# Altium PCB PCB1.PcbDoc (part 1 of 2)
Units mil, origin at the board's own origin, x right, y up, seen from the top; angles counter-clockwise.
Board outline 2100 x 2250 mil, 4 copper layers (Top Layer, GND1, GND2, Bottom Layer), stack 23.756 mil thick; 82 components, 47 nets, 265 pads, 106 vias.
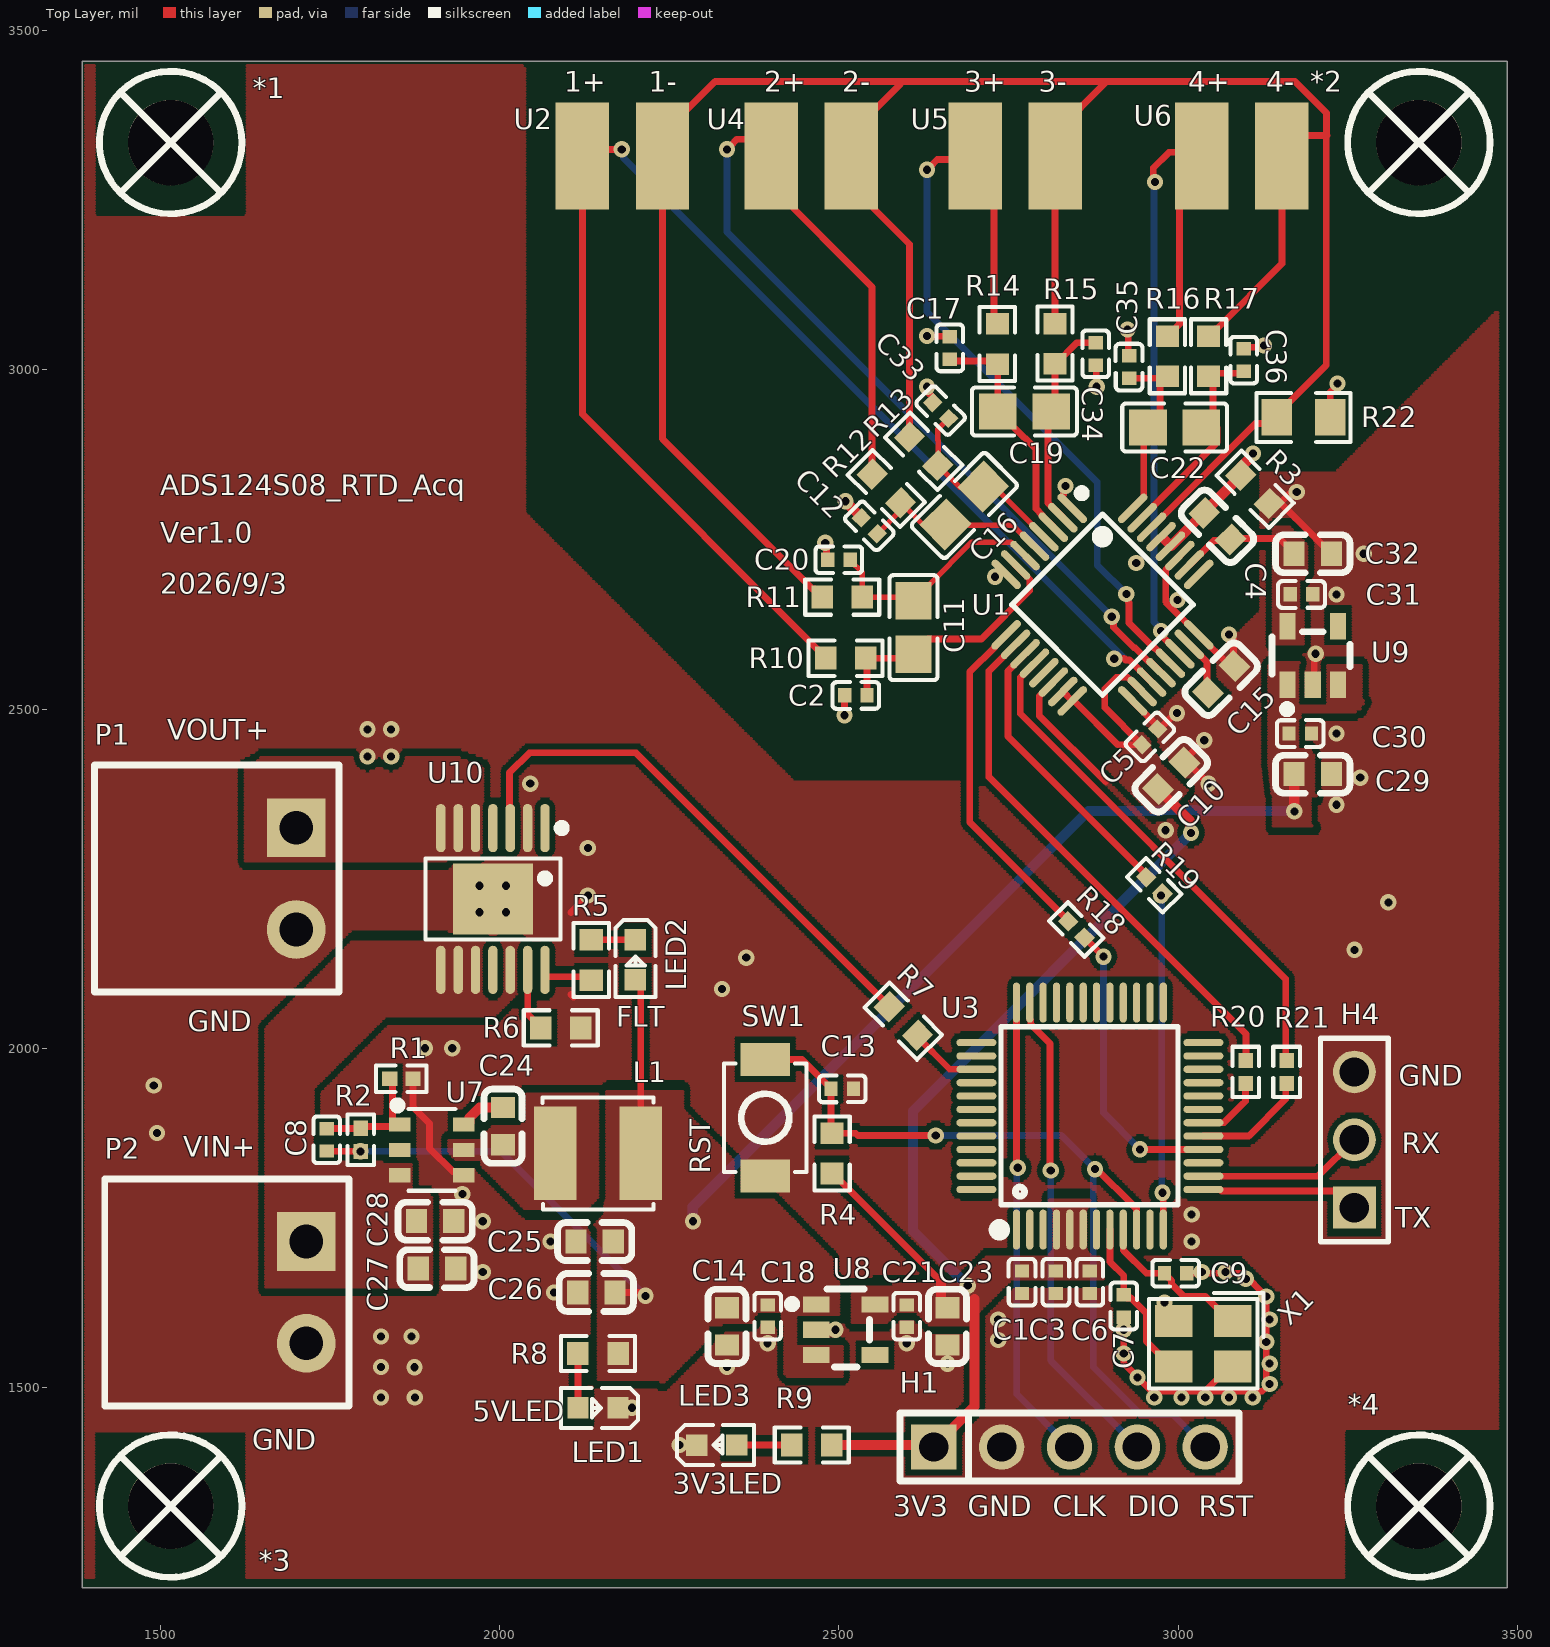
[diagram p0: Top Layer view]
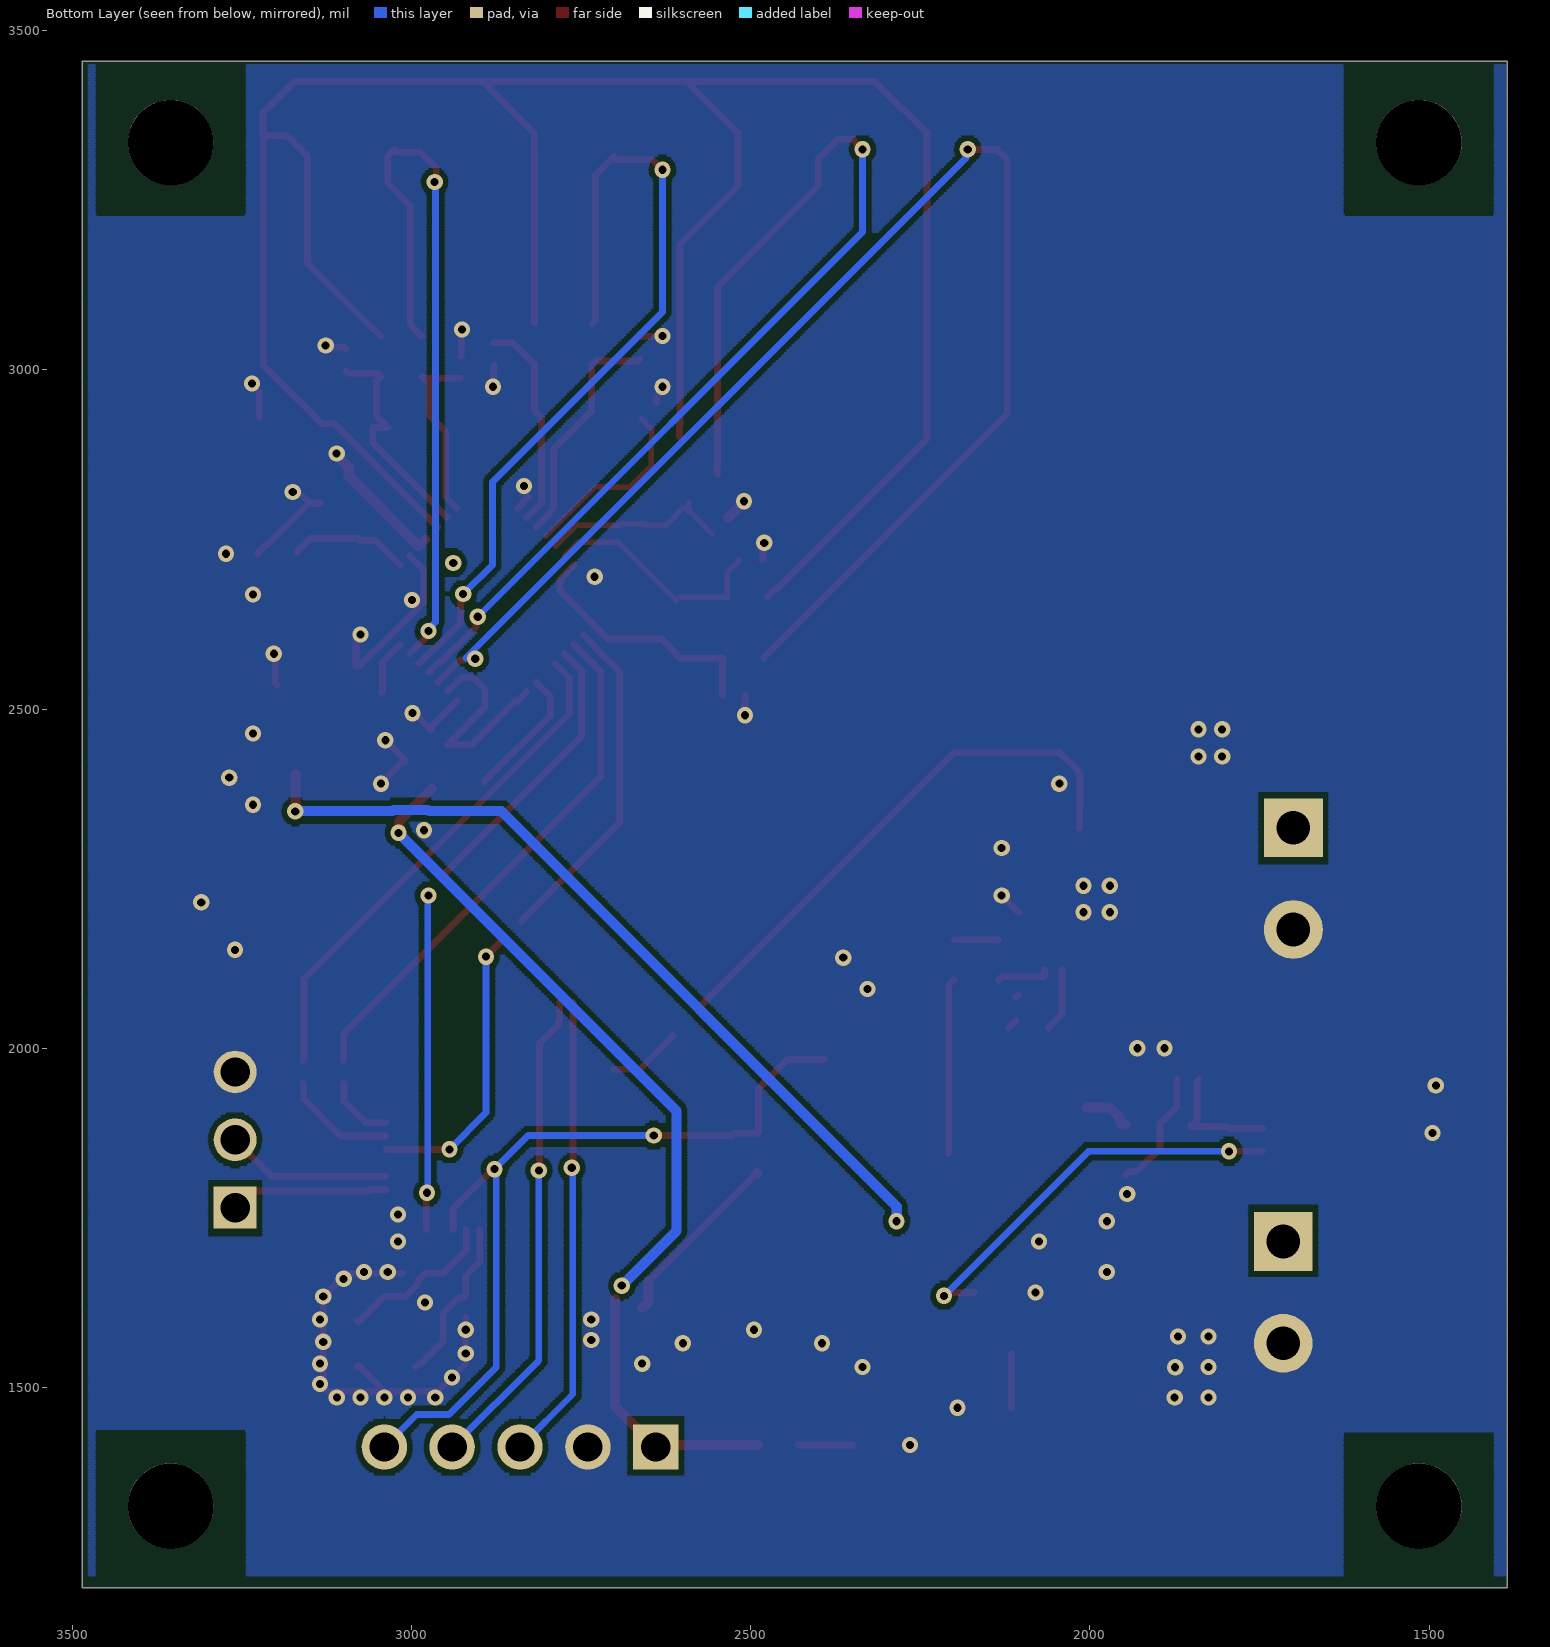
[diagram p1: Bottom Layer view, seen from below]
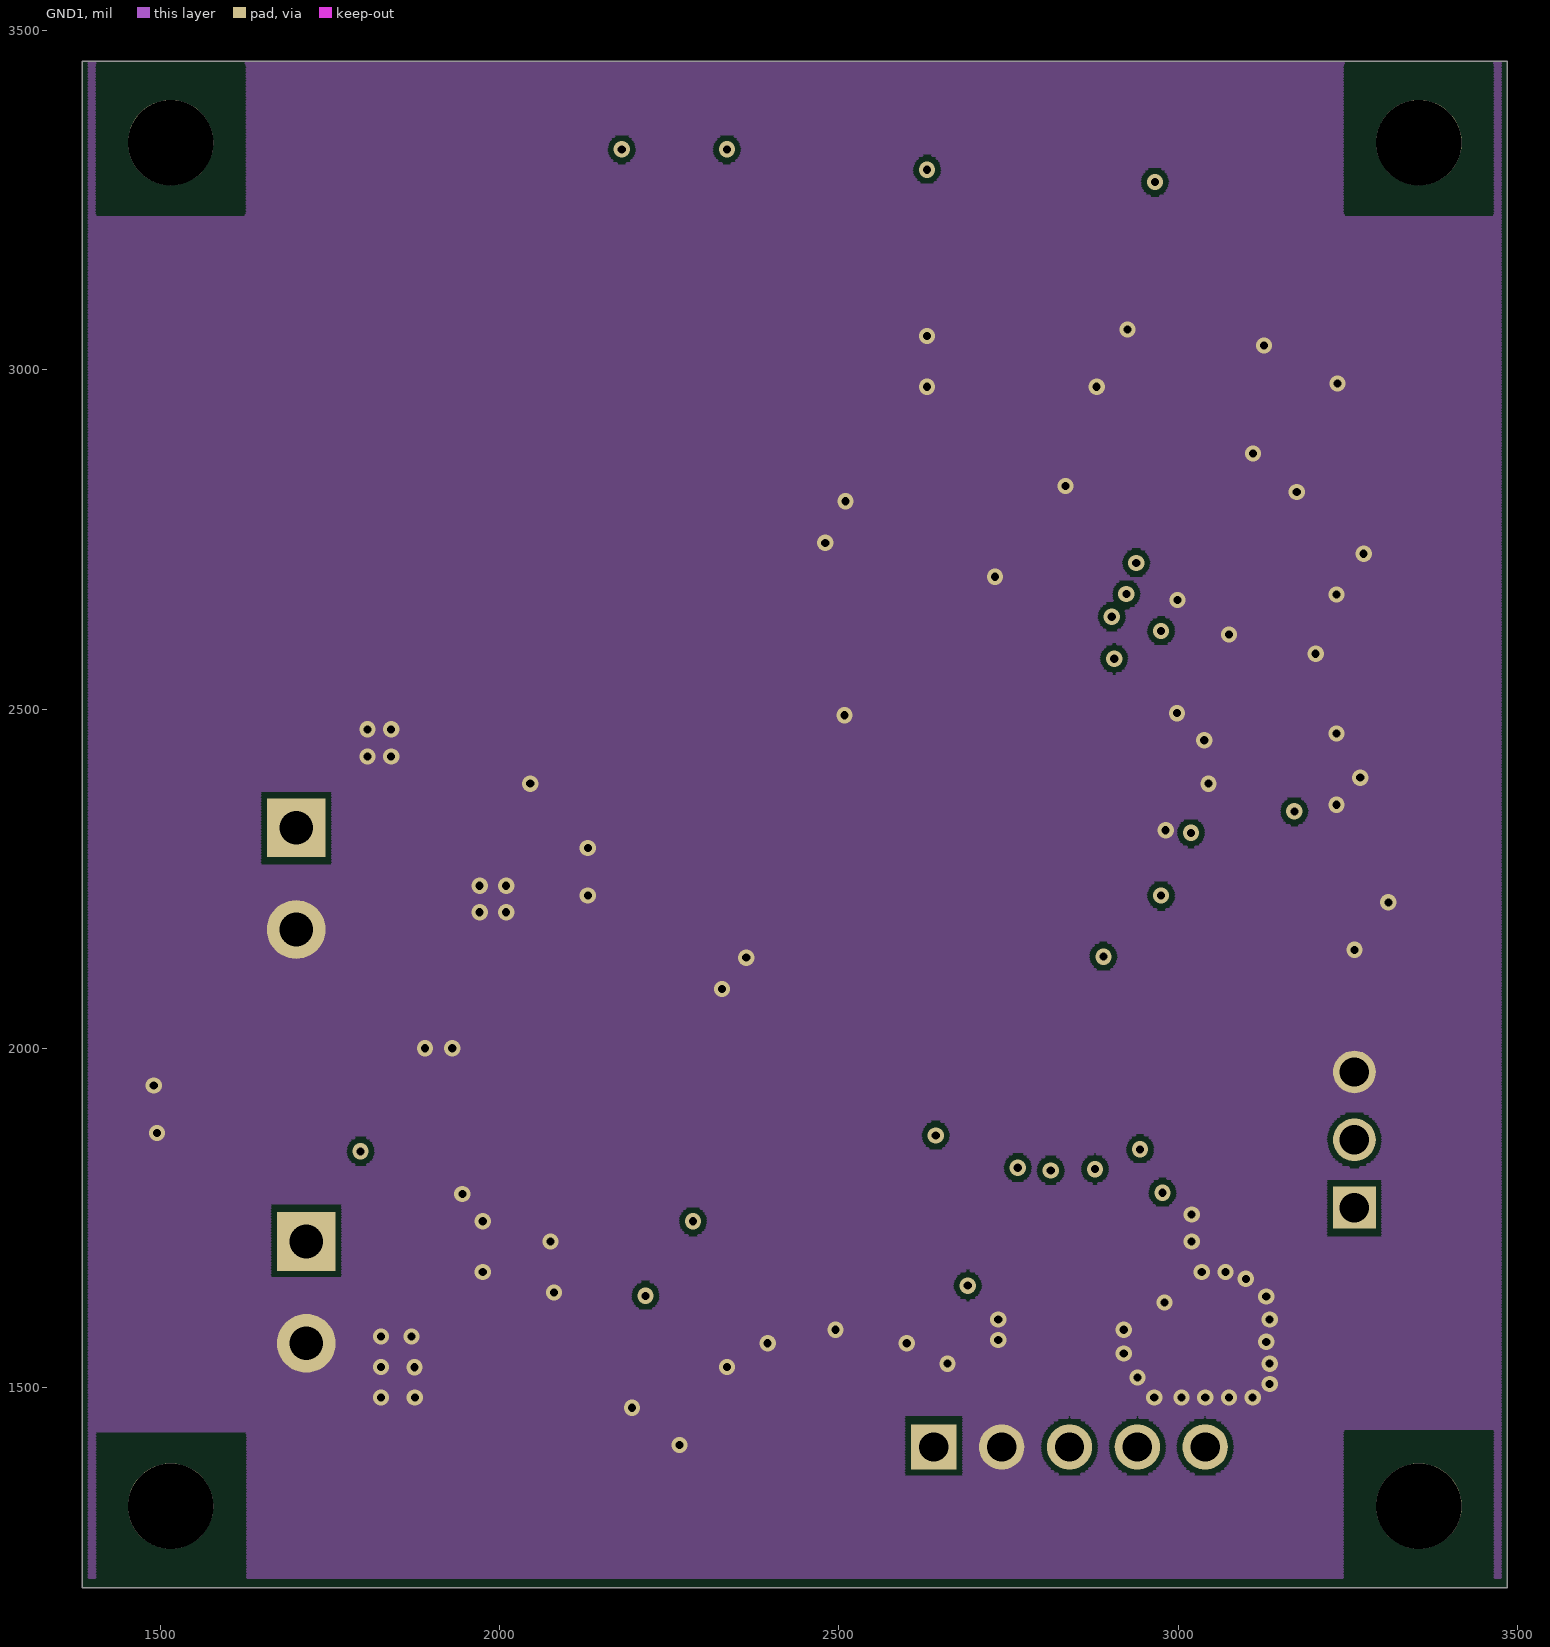
[diagram p2: GND1]
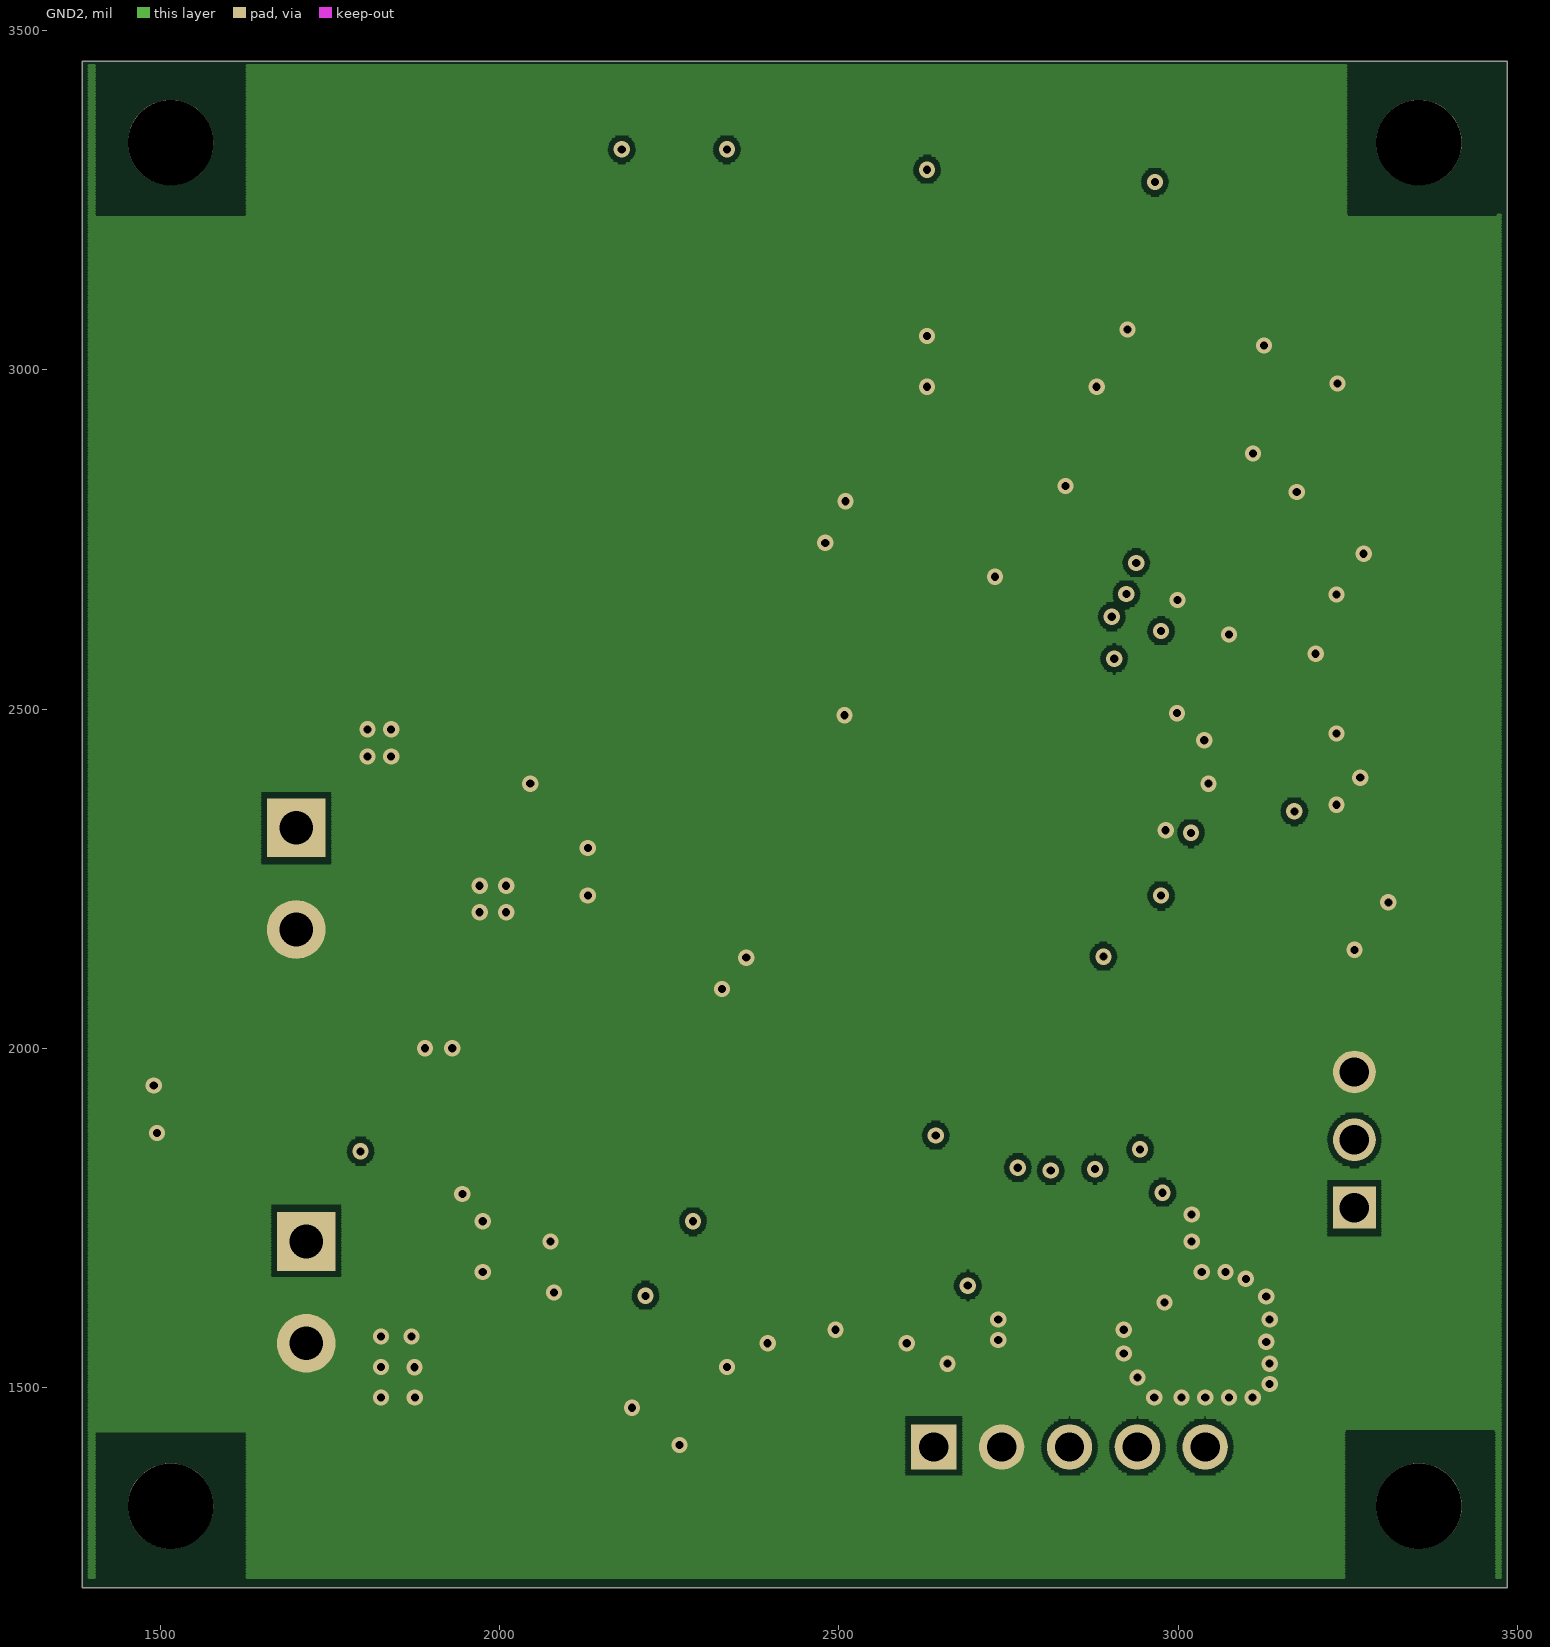
[diagram p3: GND2]

## Layer stack, top to bottom
Top Solder: solder mask 0.4, Solder Resist, Dk 3.5
Top Layer: signal copper 1.4
Dielectric 2: prepreg 2.8, PP-006, Dk 4.1
GND1: signal copper 1.378
Dielectric 1: dielectric 12.6, FR-4, Dk 4.8
GND2: signal copper 1.378
Dielectric 3: prepreg 2.8, PP-006, Dk 4.1
Bottom Layer: signal copper 1.4
Bottom Solder: solder mask 0.4, Solder Resist, Dk 3.5

## Board outline
1385,1205 1385,3455 3485,3455 3485,1205

## Design rules (kind name [scope] priority, off if disabled: settings)
Clearance [All] p1: gap=8 ignorepadtopadclearanceinfootprint=FALSE
ComponentClearance [All] p1: gap=0 collisioncheckmode=3 verticalgap=0 showdistances=FALSE
HoleSize [All] p1: absolutevalues=TRUE maxlimit=130 minlimit=1 maxpercent=80.000 minpercent=20.000
MinimumSolderMaskSliver [All] p1: minsoldermaskwidth=4
PlaneConnect [All] p1: planeconnectstyle=Direct reliefexpansion=20 reliefentries=4 reliefconductorwidth=10 reliefairgap=10
PolygonConnect [All] p1: connectstyle=Direct reliefconductorwidth=10 reliefentries=4 polygonreliefangle="90 Angle" airgapwidth=10
RoutingVias [All] p1: holewidth=28 width=50 viastyle="Through Hole" minholewidth=28 minwidth=50 maxholewidth=28 maxwidth=50
SilkToSilkClearance [All] p1: silktosilkclearance=2
SilkToSolderMaskClearance [IsPad] p1: minsilkscreentomaskgap=2 clearancetoexposedcopper=TRUE
SolderMaskExpansion [All] p1: expansion=0 istentingtop=FALSE
SupplyNets "Schematic Supply Nets_2" [InNet('VOUT')] p1: voltage=0.000
SupplyNets "Schematic Supply Nets_7" [InNet('GND')] p2: voltage=0.000
SupplyNets "Schematic Supply Nets_6" [InNet('VIN')] p3: voltage=0.000
SupplyNets "Schematic Supply Nets_5" [InNet('A3V3')] p4: voltage=0.000
SupplyNets "Schematic Supply Nets" [InNet('3V3')] p5: voltage=0.000
SupplyNets "Schematic Supply Nets_4" [InNet('5V')] p6: voltage=0.000
Width [All] p1: maxlimit=50 minlimit=6 preferedwidth=10
24 further rules are at their usual default settings.

## Components (designator, comment, footprint, x,y, rotation, side; value= is the part's Value field where it differs from the comment)
*1 "螺丝孔_1" M3螺丝 1515,3335 r0 top
*2 "螺丝孔_1" M3螺丝 3355,3335 r0 top
*3 "螺丝孔_1" M3螺丝 1515,1325 r0 top
*4 "螺丝孔_1" M3螺丝 3355,1325 r0 top
C1 "cc0402krx7r7bb104" C0402 2770,1655 r270 top value=100nF
C2 "grm1555c1h472je01d" C0402 2525,2520 r180 top value=4.7nF
C3 "cc0402krx7r7bb104" C0402 2820,1655 r270 top value=100nF
C4 "cl10b474ka8nnnc" C0603 3058.04,2769.4 r135 top value=470nF
C5 "cc0402krx7r7bb104" C0402 2958.55,2458.89 r225 top value=100nF
C6 "cc0402krx7r7bb104" C0402 2870,1655 r270 top value=100nF
C7 "cc0402jrnpo9bn180" C0402 2920,1620 r270 top value=18pF
C8 "cc0402jrnpo9bn101" C0402 1745,1865 r270 top value=100pF
C9 "cc0402jrnpo9bn180" C0402 2996.46,1668.39 r180 top value=18pF
C10 "hgc0603r5106m350nthj" C0603 2989.94,2401.65 r45 top value=10uF
C11 "cl21b103kbannnc" C0805 2610,2620 r270 top value=10nF
C12 "grm1555c1h472je01d" C0402 2545,2770 r135 top value=4.7nF
C13 "cc0402krx7r7bb104" C0402 2505,1940 r180 top value=100nF
C14 "cga0603x5r105k500jt" C0603 2335,1590 r270 top value=1uF
C15 "cga0603x5r105k500jt" C0603 3063.55,2543.89 r45 top value=1uF
C16 "cl21b103kbannnc" C0805 2685,2800 r225 top value=10nF
C17 "grm1555c1h472je01d" C0402 2663.55,3032.35 r90 top value=4.7nF
C18 "cc0402krx7r7bb104" C0402 2395,1605 r270 top value=100nF
C19 "cl21b103kbannnc" C0805 2773.55,2938.55 r180 top value=10nF
C20 "grm1555c1h472je01d" C0402 2500,2720 r180 top value=4.7nF
C21 "cc0402krx7r7bb104" C0402 2600,1605 r270 top value=100nF
C22 "cl21b103kbannnc" C0805 2995,2915 r180 top value=10nF
C23 "cga0603x5r105k500jt" C0603 2660,1590 r270 top value=1uF
C24 "cga0603x7r104k500jt" C0603 2005,1885 r90 top value=100nF
C25 "hgc0603r5226m160nthj" C0603 2140,1715 r0 top value=22uF
C26 "hgc0603r5226m160nthj" C0603 2142.44,1640 r0 top value=22uF
C27 "hgc0603r5106m350nthj" C0603 1907.56,1675 r180 top value=10uF
C28 "cga0603x7r104k500jt" C0603 1905,1745 r180 top value=100nF
C29 "cga0603x5r105k500jt" C0603 3198.55,2403.89 r0 top value=1uF
C30 "cc0402krx7r7bb104" C0402 3180.09,2463.89 r0 top value=100nF
C31 "cc0402krx7r7bb104" C0402 3182.01,2668.89 r0 top value=100nF
C32 "cga0603x5r105k500jt" C0603 3198.55,2728.89 r0 top value=1uF
C33 "grm1555c1h472je01d" C0402 2650,2940 r135 top value=4.7nF
C34 "grm1555c1h472je01d" C0402 2878.55,3023.55 r270 top value=4.7nF
C35 "grm1555c1h472je01d" C0402 2927.77,3004.06 r90 top value=4.7nF
C36 "grm1555c1h472je01d" C0402 3096.72,3014.31 r90 top value=4.7nF
H1 "pz254v-11-05p" HDR-TH_5P-P2.54-V-M 2840.05,1412.16 r0 top
H4 "lail-pz2.54-3p-l" HDR-TH_3P-P2.54-V-M-1 3260,1865 r90 top
L1 "wpn4020h100mt" IND-SMD_L4.0-W4.0 2145,1845 r0 top value=10uH
LED1 "ltst-c190kskt" LED0603-RD 2145,1470 r180 top
LED2 "ltst-c190kskt" LED0603-RD 2200.01,2130.51 r270 top
LED3 "ltst-c190kskt" LED0603-RD 2320,1415 r0 top
P1 "wj15edgrc-3.81-02p-14-00a" CONN-TH_2P-P3.81_WJ15EDGRC-3.81-2P 1700,2250 r270 top
P2 "wj15edgrc-3.81-02p-14-00a" CONN-TH_2P-P3.81_WJ15EDGRC-3.81-2P 1715,1640 r270 top
R1 "rt0402brd0726k1l" R0402 1855,1955 r180 top value=26.1kΩ
R2 "frc0402f1373ts" R0402 1795,1865 r90 top value=137kΩ
R3 "0603waf0000t5e" R0603 3113.55,2823.89 r135 top value=0Ω
R4 "frc0603f1002ts" R0603 2490,1845 r270 top value=10kΩ
R5 "0603waf1001t5e" R0603 2135,2130 r90 top value=1kΩ
R6 "frc0603f3601ts" R0603 2090,2030 r0 top value=3.6kΩ
R7 "0603waf1001t5e" R0603 2595,2040 r135 top value=1kΩ
R8 "0603waf1001t5e" R0603 2145,1550 r0 top value=1kΩ
R9 "0603waf1001t5e" R0603 2460,1415 r0 top value=1kΩ
R10 "frc0603f1000ts" R0603 2510,2575 r180 top value=100Ω
R11 "frc0603f1000ts" R0603 2505,2665 r180 top value=100Ω
R12 "frc0603f1000ts" R0603 2570,2825 r135 top value=100Ω
R13 "frc0603f1000ts" R0603 2625,2880 r135 top value=100Ω
R14 "frc0603f1000ts" R0603 2733.55,3038.21 r90 top value=100Ω
R15 "frc0603f1000ts" R0603 2818.55,3038.55 r90 top value=100Ω
R16 "frc0603f1000ts" R0603 2984.32,3020 r90 top value=100Ω
R17 "frc0603f1000ts" R0603 3045,3020 r90 top value=100Ω
R18 "frc0402f47r0ts" R0402 2850,2175 r135 top value=47Ω
R19 "frc0402f47r0ts" R0402 2965,2240 r135 top value=47Ω
R20 "frc0402f47r0ts" R0402 3100,1965 r90 top value=47Ω
R21 "frc0402f47r0ts" R0402 3160,1965 r90 top value=47Ω
R22 "frc0805f3001ts" R0805 3185,2930 r0 top value=3kΩ
SW1 "ts-1088-ar02016" SW-SMD_L3.9-W3.0-P4.45 2391.45,1897.48 r90 top
U1 "ads124s08ipbsr_c39676001" TQFP-32_L5.0-W5.0-P0.50-LS7.0-BL 2888.55,2653.89 r225 top
U2 "pt1000焊盘" PT1000焊盘 2121.89,3315 r0 top
U3 "stm32g031c8t6" LQFP-48_L7.0-W7.0-P0.50-LS9.0-BL 2870,1900 r0 top
U4 "pt1000焊盘" PT1000焊盘 2400.44,3315 r0 top
U5 "pt1000焊盘" PT1000焊盘 2701.04,3315 r0 top
U6 "pt1000焊盘" PT1000焊盘 3035,3315 r0 top
U7 "ap63201wu-7" TSOT-23-6_L2.9-W1.6-P0.95-LS2.8-BR 1900,1850 r180 top
U8 "tps7a2033pdbvr" SOT-23-5_L2.9-W1.6-P0.95-LS2.8-BR 2510,1585 r180 top
U9 "tps7a2033pdbvr" SOT-23-5_L2.9-W1.6-P0.95-LS2.8-BR 3198.55,2578.89 r270 top
U10 "tps27s100apwpr" TSSOP-14_L5.0-W4.4-P0.65-LS6.4-BL-EP 1990,2220 r180 top
X1 "x32258mob4si" CRYSTAL-SMD_4P-L3.2-W2.5-BL 3037.18,1564.39 r180 top value=8MHz

## Footprints (in the part's own frame and the unit in brackets; to place one, negate y for a bottom-side part, rotate by r counter-clockwise, add the part's x,y. Pads: shape width x height; smd on the part's side, far side on the other; paste and mask are expansions set on the pad)
C0402 [mm]
  rect 0.5x0.54 smd: 1(-0.42,0) 2(0.42,0)
  silkscreen extent -0.87,-0.5 0.87,0.5
C0603 [mm]
  rect 0.8x0.9 smd: 1(-0.7,0) 2(0.7,0)
  silkscreen extent -1.39,-0.71 1.39,0.71
C0805 [mm]
  rect 1.41x1.35 smd paste-100 mask+0.051: 1(-1,0) 2(1,0)
  silkscreen extent -1.96,-0.9 1.96,0.9
CONN-TH_2P-P3.81_WJ15EDGRC-3.81-2P [mm]
  rect 2.2x2.2 hole 1.26: 1(-1.905,0)
  round 2.2 hole 1.26: 2(1.905,0)
  silkscreen extent -4.25,-7.55 4.25,1.6
CRYSTAL-SMD_4P-L3.2-W2.5-BL [mm]
  rect 1.4x1.2 smd: 1(-1.1,-0.85) 2(1.1,-0.85) 3(1.1,0.85) 4(-1.1,0.85)
  silkscreen extent -2.26,-1.91 2.03,1.68
HDR-TH_3P-P2.54-V-M-1 [mm]
  rect 1.575x1.6 hole 1.1 paste-2539.97 mask+0.05: 1(-2.54,0)
  round 1.6 hole 1.1 paste-2539.97 mask+0.05: 2(0,0) 3(2.54,0)
  silkscreen extent -3.81,-1.27 3.81,1.27
HDR-TH_5P-P2.54-V-M [mm]
  rect 1.7x1.7 hole 1.1: 1(-5.08,0)
  round 1.7 hole 1.1: 2(-2.54,0) 3(0,0) 4(2.54,0) 5(5.08,0)
  silkscreen extent -6.35,-1.27 6.35,1.27
IND-SMD_L4.0-W4.0 [mm]
  rect 1.6x3.5 smd: 1(-1.6,0) 2(1.6,0)
  silkscreen extent -2.08,-2.1 2.08,2.1
LED0603-RD [mm]
  rect 0.8x0.8 smd: 1(-0.749,0) 2(0.749,0)
  silkscreen extent -1.49,-0.75 1.39,0.76
LQFP-48_L7.0-W7.0-P0.50-LS9.0-BL [mm]
  oval 0.27x1.5 smd paste+0 mask+0.05: 1(-2.75,-4.25) 2(-2.25,-4.25) 3(-1.75,-4.25) 4(-1.25,-4.25) 5(-0.75,-4.25) 6(-0.25,-4.25) 7(0.25,-4.25) 8(0.75,-4.25) 9(1.25,-4.25) 10(1.75,-4.25) 11(2.25,-4.25) 12(2.75,-4.25) 25(2.75,4.25) 26(2.25,4.25) 27(1.75,4.25) 28(1.25,4.25) 29(0.75,4.25) 30(0.25,4.25) 31(-0.25,4.25) 32(-0.75,4.25) 33(-1.25,4.25) 34(-1.75,4.25) 35(-2.25,4.25) 36(-2.75,4.25)
  oval 1.5x0.27 smd paste+0 mask+0.05: 13(4.25,-2.75) 14(4.25,-2.25) 15(4.25,-1.75) 16(4.25,-1.25) 17(4.25,-0.75) 18(4.25,-0.25) 19(4.25,0.25) 20(4.25,0.75) 21(4.25,1.25) 22(4.25,1.75) 23(4.25,2.25) 24(4.25,2.75) 37(-4.25,2.75) 38(-4.25,2.25) 39(-4.25,1.75) 40(-4.25,1.25) 41(-4.25,0.75) 42(-4.25,0.25) 43(-4.25,-0.25) 44(-4.25,-0.75) 45(-4.25,-1.25) 46(-4.25,-1.75) 47(-4.25,-2.25) 48(-4.25,-2.75)
  silkscreen extent -3.59,-4.46 3.3,3.34
M3螺丝 [mil]
  round 126 hole 126 paste-99999 mask+4: 1(0,0)
  silkscreen extent -105,-105 105,105
PT1000焊盘 [mm]
  rect 2x4 smd: 1(0,0) 2(3,0)
R0402 [mm]
  rect 0.566x0.54 smd paste-100 mask+0.051: 1(-0.433,0) 2(0.433,0)
  silkscreen extent -0.94,-0.5 0.94,0.5
R0603 [mil]
  rect 31.75x34.02 smd paste-3937.01 mask+2: 1(-29.66,0) 2(29.66,0)
  silkscreen extent -55,-26 55,26
R0805 [mil]
  rect 44.59x54.21 smd paste-3937.01 mask+2: 1(-39.37,0) 2(39.37,0)
  silkscreen extent -69,-36 69,36
SOT-23-5_L2.9-W1.6-P0.95-LS2.8-BR [mm]
  rect 1x0.6 smd paste+0 mask+0.05: 1(1.1,-0.95) 2(1.1,0) 3(1.1,0.95) 4(-1.1,0.95) 5(-1.1,-0.95)
  silkscreen extent -0.89,-1.52 2.16,1.4
SW-SMD_L3.9-W3.0-P4.45 [mm]
  rect 1.23x1.86 smd: 1(-2.185,0) 2(2.185,0)
  silkscreen extent -2.03,-1.54 2.03,1.54
TQFP-32_L5.0-W5.0-P0.50-LS7.0-BL [mm]
  oval 0.28x1.45 smd: 1(-1.75,-3.35) 2(-1.25,-3.35) 3(-0.75,-3.35) 4(-0.25,-3.35) 5(0.25,-3.35) 6(0.75,-3.35) 7(1.25,-3.35) 8(1.75,-3.35) 17(1.75,3.35) 18(1.25,3.35) 19(0.75,3.35) 20(0.25,3.35) 21(-0.25,3.35) 22(-0.75,3.35) 23(-1.25,3.35) 24(-1.75,3.35)
  oval 1.45x0.28 smd: 9(3.35,-1.75) 10(3.35,-1.25) 11(3.35,-0.75) 12(3.35,-0.25) 13(3.35,0.25) 14(3.35,0.75) 15(3.35,1.25) 16(3.35,1.75) 25(-3.35,1.75) 26(-3.35,1.25) 27(-3.35,0.75) 28(-3.35,0.25) 29(-3.35,-0.25) 30(-3.35,-0.75) 31(-3.35,-1.25) 32(-3.35,-1.75)
  silkscreen extent -2.55,-3.65 2.4,2.4
TSOT-23-6_L2.9-W1.6-P0.95-LS2.8-BR [mm]
  rect 0.8x0.532 smd: 1(1.2,-0.95) 2(1.2,0) 3(1.2,0.95) 4(-1.2,0.95) 5(-1.2,0) 6(-1.2,-0.95)
  silkscreen extent -0.88,-1.82 1.44,1.53
TSSOP-14_L5.0-W4.4-P0.65-LS6.4-BL-EP [mm]
  oval 0.35x1.809 smd: 1(-1.95,-2.655) 2(-1.3,-2.655) 3(-0.65,-2.655) 4(0,-2.655) 5(0.65,-2.655) 6(1.3,-2.655) 7(1.95,-2.655) 8(1.95,2.655) 9(1.3,2.655) 10(0.65,2.655) 11(0,2.655) 12(-0.65,2.655) 13(-1.3,2.655) 14(-1.95,2.655)
  rect 3x2.65 smd: 15(0,0)
  silkscreen extent -2.73,-2.8 2.53,1.52

## Part data
C1 C3 C5 C6 C13 C18 C21 C30 C31: "容值:100nF;精度:±10%;额定电压:16V;温度系数:X7R;", JLCPCB Part Class="Extended Part", LCSC Part Name="100nF ±10% 16V", Manufacturer=YAGEO(国巨), ManufacturerPart=CC0402KRX7R7BB104, Temperature Coefficient=X7R, Tolerance=±10%, Voltage Rating=16V, AddInBom=yes, ConvertToPcb=yes, Datasheet=https://item.szlcsc.com/datasheet/CC0402KRX7R7BB104/61526.html, FootprintName=C0402, ModelId=36a51122f27c49738f86b3bfa98863e0, ModelName=C0402_L1.0-W0.5-H0.5, ModelTransform=39.37,19.685,0,0,0,0,0,0,0, Supplier=LCSC, Supplier Footprint=0402, SupplierPart=C60474, Symbol=CC0402KRX7R7BB104
C2 C12 C17 C20 C33 C34 C35 C36: "容值:4.7nF;精度:±5%;额定电压:50V;温度系数:C0G;", JLCPCB Part Class="Extended Part", LCSC Part Name="4.7nF ±5% 50V", Manufacturer=muRata(村田), ManufacturerPart=GRM1555C1H472JE01D, Temperature Coefficient=C0G, Tolerance=±5%, Voltage Rating=50V, AddInBom=yes, ConvertToPcb=yes, Datasheet=https://item.szlcsc.com/datasheet/GRM1555C1H472JE01D/1609001.html, FootprintName=C0402, ModelId=36a51122f27c49738f86b3bfa98863e0, ModelName=C0402_L1.0-W0.5-H0.5, ModelTransform=39.37,19.685,0,0,0,0,0,0,0, Supplier=LCSC, Supplier Footprint=0402, SupplierPart=C1518204, Symbol=GRM1555C1H472JE01D
C4: "容值:470nF;精度:±10%;额定电压:25V;温度系数:X7R;", JLCPCB Part Class="Basic Part", LCSC Part Name="470nF ±10% 25V", Manufacturer=SAMSUNG(三星), ManufacturerPart=CL10B474KA8NNNC, Temperature Coefficient=X7R, Tolerance=±10%, Voltage Rating=25V, AddInBom=yes, ConvertToPcb=yes, Datasheet=https://item.szlcsc.com/datasheet/CL10B474KA8NNNC/1975.html, FootprintName=C0603, ModelId=ac125912035d415993ca9572d50418b1, ModelName=C0603_L1.6-W0.8-H0.8, ModelTransform=62.992,31.496,0,0,0,0,0,0,0, Supplier=LCSC, Supplier Footprint=0603, SupplierPart=C1623, Symbol=CL10B474KA8NNNC
C7 C9: "容值:18pF;精度:±5%;额定电压:50V;温度系数:NP0;", JLCPCB Part Class="Extended Part", LCSC Part Name="18pF ±5% 50V", Manufacturer=YAGEO(国巨), ManufacturerPart=CC0402JRNPO9BN180, Temperature Coefficient=NP0, Tolerance=±5%, Voltage Rating=50V, AddInBom=yes, ConvertToPcb=yes, Datasheet=https://item.szlcsc.com/datasheet/CC0402JRNPO9BN180/107417.html, FootprintName=C0402, ModelId=36a51122f27c49738f86b3bfa98863e0, ModelName=C0402_L1.0-W0.5-H0.5, ModelTransform=39.37,19.685,0,0,0,0,0,0,0, Supplier=LCSC, Supplier Footprint=0402, SupplierPart=C106202, Symbol=CC0402JRNPO9BN180
C8: "容值:100pF;精度:±5%;额定电压:50V;温度系数:NP0;", JLCPCB Part Class="Extended Part", LCSC Part Name="100pF ±5% 50V", Manufacturer=YAGEO(国巨), ManufacturerPart=CC0402JRNPO9BN101, Temperature Coefficient=NP0, Tolerance=±5%, Voltage Rating=50V, AddInBom=yes, ConvertToPcb=yes, Datasheet=https://item.szlcsc.com/datasheet/CC0402JRNPO9BN101/107415.html, FootprintName=C0402, ModelId=36a51122f27c49738f86b3bfa98863e0, ModelName=C0402_L1.0-W0.5-H0.5, ModelTransform=39.37,19.685,0,0,0,0,0,0,0, Supplier=LCSC, Supplier Footprint=0402, SupplierPart=C106200, Symbol=CC0402JRNPO9BN101
C10 C27: "容值:10uF;精度:±20%;额定电压:35V;温度系数:X5R;", JLCPCB Part Class="Extended Part", LCSC Part Name="10uF ±20% 35V", Manufacturer=Chinocera(华瓷), ManufacturerPart=HGC0603R5106M350NTHJ, Temperature Coefficient=X5R, Tolerance=±20%, Voltage Rating=35V, AddInBom=yes, ConvertToPcb=yes, Datasheet=https://item.szlcsc.com/datasheet/HGC0603R5106M350NTHJ/23841132.html, FootprintName=C0603, ModelId=ac125912035d415993ca9572d50418b1, ModelName=C0603_L1.6-W0.8-H0.8, ModelTransform=62.992,31.496,0,0,0,0,0,0,0, Supplier=LCSC, Supplier Footprint=0603, SupplierPart=C22367827, Symbol=HGC0603R5106M350NTHJ
C11 C16 C19 C22: "容值:10nF;精度:±10%;额定电压:50V;温度系数:X7R;", JLCPCB Part Class="Basic Part", LCSC Part Name="10nF ±10% 50V", Manufacturer=SAMSUNG(三星), ManufacturerPart=CL21B103KBANNNC, Temperature Coefficient=X7R, Tolerance=±10%, Voltage Rating=50V, AddInBom=yes, ConvertToPcb=yes, Datasheet=https://item.szlcsc.com/datasheet/CL21B103KBANNNC/2062.html, FootprintName=C0805, ModelId=1ba041120af144c991958decab20d241, ModelName=C0805_L2.0-W1.3-H1.3, ModelTransform=78.74,51.181,0,0,0,0,0,0.0005,0, Supplier=LCSC, Supplier Footprint=0805, SupplierPart=C1710, Symbol=CL21B103KBANNNC
C14 C15 C23 C29 C32: "容值:1uF;精度:±10%;额定电压:50V;温度系数:X5R;", JLCPCB Part Class="Extended Part", LCSC Part Name="1uF ±10% 50V 停产", Manufacturer=HRE(芯声), ManufacturerPart=CGA0603X5R105K500JT, Temperature Coefficient=X5R, Tolerance=±10%, Voltage Rating=50V, AddInBom=yes, ConvertToPcb=yes, Datasheet=https://item.szlcsc.com/datasheet/CGA0603X5R105K500JT/7062558.html, FootprintName=C0603, ModelId=ac125912035d415993ca9572d50418b1, ModelName=C0603_L1.6-W0.8-H0.8, ModelTransform=62.992,31.496,0,0,0,0,0,0,0, Supplier=LCSC, Supplier Footprint=0603, SupplierPart=C6119852, Symbol=CGA0603X5R105K500JT
C24 C28: "容值:100nF;精度:±10%;额定电压:50V;温度系数:X7R;", JLCPCB Part Class="Extended Part", LCSC Part Name="100nF ±10% 50V", Manufacturer=HRE(芯声), ManufacturerPart=CGA0603X7R104K500JT, Temperature Coefficient=X7R, Tolerance=±10%, Voltage Rating=50V, AddInBom=yes, ConvertToPcb=yes, Datasheet=https://item.szlcsc.com/datasheet/CGA0603X7R104K500JT/7062573.html, FootprintName=C0603, ModelId=ac125912035d415993ca9572d50418b1, ModelName=C0603_L1.6-W0.8-H0.8, ModelTransform=62.992,31.496,0,0,0,0,0,0,0, Supplier=LCSC, Supplier Footprint=0603, SupplierPart=C6119867, Symbol=CGA0603X7R104K500JT
C25 C26: "容值:22uF;精度:±20%;额定电压:16V;温度系数:X5R;", JLCPCB Part Class="Extended Part", LCSC Part Name="22uF ±20% 16V", Manufacturer=Chinocera(华瓷), ManufacturerPart=HGC0603R5226M160NTHJ, Temperature Coefficient=X5R, Tolerance=±20%, Voltage Rating=16V, AddInBom=yes, ConvertToPcb=yes, Datasheet=https://item.szlcsc.com/datasheet/HGC0603R5226M160NTHJ/23841133.html, FootprintName=C0603, ModelId=ac125912035d415993ca9572d50418b1, ModelName=C0603_L1.6-W0.8-H0.8, ModelTransform=62.992,31.496,0,0,0,0,0,0,0, Supplier=LCSC, Supplier Footprint=0603, SupplierPart=C22367828, Symbol=HGC0603R5226M160NTHJ
H1: "插针结构:1x5P;间距:2.54mm;行距:-;圆针/方针:方针;安装方式:直插;排数:单排;总PIN位数:5P;额定电流:3A;额定电压:250V;配合针长度:6mm;塑高:2.5mm;端接针长度:3mm;触头材质:黄铜;触头镀层:-;工作温度:-40℃~+105℃;颜色:黑色;", Color=黑色, Current Rating=3A, JLCPCB Part Class="Extended Part", LCSC Part Name="1x5P 间距:2.54mm 方针 直插", Manufacturer=XFCN(兴飞), ManufacturerPart=PZ254V-11-05P, Operating Temperature=-40℃~+105℃, Voltage Rating (Max)=250V, AddInBom=yes, Circluar Pins/Square Pins=方针, Contact Material=黄铜, Contact Plating=-, ConvertToPcb=yes, Datasheet=https://item.szlcsc.com/datasheet/PZ254V-11-05P/502960.html, FootprintName=HDR-TH_5P-P2.54-V-M, Insulation Height=2.5mm, Length of End Connection Pin=3mm, Length of Mating Pin=6mm, ModelId=47d466e4a34f4fc5bc626cf773a24dd5, ModelName=HDR-TH_5P-P2.54-M-LI-1X5P, ModelTransform=499.999,100,0,0,0,0,0,0,-118.11, Mounting Type=直插, Number of Pins=5P, Number of Rows=单排, Pin Structure=1x5P, Pitch=2.54mm, Row Spacing=-, Supplier=LCSC, Supplier Footprint=插件,P=2.54mm, SupplierPart=C492404, Symbol=PZ254V-11-05P
H4: "插针结构:1x3P;间距:2.54mm;圆针/方针:方针;排数:单排;总PIN位数:3P;额定电流:3A;额定电压:250V;塑高:2.5mm;端接针长度:3mm;触头材质:黄铜;触头镀层:金;工作温度:-25℃~+80℃;颜色:黑色;", Color=黑色, Current Rating=3A, JLCPCB Part Class="Extended Part", LCSC Part Name="1x3P 间距:2.54mm 方针", Manufacturer=LAILAN(莱联), ManufacturerPart=LAIL-PZ2.54-3P-L, Operating Temperature=-25℃~+80℃, Voltage Rating (Max)=250V, AddInBom=yes, Circluar Pins/Square Pins=方针, Contact Material=黄铜, Contact Plating=金, ConvertToPcb=yes, Datasheet=https://item.szlcsc.com/datasheet/LAIL-PZ2.54-3P-L/58519957.html, FootprintName=HDR-TH_3P-P2.54-V-M-1, Insulation Height=2.5mm, Length of End Connection Pin=3mm, ModelId=94a8ffe137b6410295cb18cd3ffd99db, ModelName=HDR-M-2.54_1x3, ModelTransform=299.9994,100,0,0,0,0,0,0,-118.11, Number of Pins=3P, Number of Rows=单排, Pin Structure=1x3P, Pitch=2.54mm, Supplier=LCSC, Supplier Footprint=插件,P=2.54mm, SupplierPart=C54950604, SymbolName=LAIL-PZ2.54-3P-L
L1: "电感值:10uH;精度:±20%;额定电流:2A;饱和电流(Isat):3.5A;类型:-;", Current - Saturation(Isat)=3.5A, Current Rating=2A, DC Resistance(DCR)=216mΩ, JLCPCB Part Class="Extended Part", LCSC Part Name="10uH ±20% 3.5A", Manufacturer=Sunlord(顺络), ManufacturerPart=WPN4020H100MT, Ratings=-, Tolerance=±20%, AddInBom=yes, ConvertToPcb=yes, Datasheet=https://item.szlcsc.com/datasheet/WPN4020H100MT/99573.html, FootprintName=IND-SMD_L4.0-W4.0, ModelId=45bc3737ecfd4f3bb122605ee525b018, ModelName=IND-SMD_L4.0-W4.0-H1.9, ModelTransform=157.48,157.484,0,0,0,0,0,0,0, Supplier=LCSC, Supplier Footprint=SMD,4x4mm, SupplierPart=C98364, Symbol=WPN4020H100MT, Type=-
LED1 LED2 LED3: "灯头类型:-;发光颜色:黄色;正向压降(Vf):2.1V;功率:75mW;正向电流:20mA;波长:584.5nm~597nm;二极管配置:独立二极管;透镜颜色:无色透明透镜;色温:-;发光强度:104mcd;发光角度:130°;载带方式:-;工作温度:-30℃~+85℃;", Color Temperature=-, Forward Current=20mA, Illumination Color=黄色, JLCPCB Part Class="Extended Part", LCSC Part Name=黄灯, Lens Color=无色透明透镜, Manufacturer=LITEON(光宝), ManufacturerPart=LTST-C190KSKT, Operating Temperature=-30℃~+85℃, Power(Watts)=75mW, Voltage - Forward(Vf)=2.1V, AddInBom=yes, ConvertToPcb=yes, Datasheet=https://item.szlcsc.com/datasheet/LTST-C190KSKT/136371.html, Diode Configuration=独立二极管, FootprintName=LED0603-RD, Lamp Holder Type=-, Luminous Intensity=104mcd, ModelId=1f0d29a91be547639d425604e9b96ebb, ModelName=LED0603-RD, ModelTransform=63.7794,32.283,0,0,0,0,0,0,0, Mounting Style=-, Peak Wavelength=588nm, Supplier=LCSC, Supplier Footprint=0603, SupplierPart=C125095, Symbol=LTST-C190KSKT, Viewing Angle=130°, Wavelength - Dominant=584.5nm~597nm
P1 P2: "连接器类型:板端/插座-闭口;固定方式:无固定装置;结构:1x2P;间距:3.81mm;颜色:绿色;安装方式:弯插;排数:1;每排PIN数:2;额定电流:8A;额定电压:300V;线规 - AWG:-;线规 - 平方毫米:-;工作温度:-40℃~+105℃;", Color=绿色, Current Rating=8A, JLCPCB Part Class="Extended Part", LCSC Part Name="无固定装置 1x2P 3.81mm 排数:1 每排P数:2", Manufacturer=KANGNEX(康奈克斯电气), ManufacturerPart=WJ15EDGRC-3.81-02P-14-00A, Operating Temperature=-40℃~+105℃, Voltage Rating (Max)=300V, AddInBom=yes, Connection Type=-, Connector Type=板端/插座-闭口, ConvertToPcb=yes, Datasheet=https://item.szlcsc.com/datasheet/WJ15EDGRC-3.81-02P-14-00A/8881.html, FootprintName=CONN-TH_2P-P3.81_WJ15EDGRC-3.81-2P, ModelId=816ec8aca6fe4785be70cb4c5121258d, ModelName=CONN-TH_2P_L8.5-W9.2-H7.0-P3.81, ModelTransform=334.645,360.2355,0,0,0,0,0,-118.11,-137.795, Mounting Type=弯插, Number of Pins=2P, Number of PINs Per Row=2, Number of Positions or Pins=1x2P, Number of Rows=1, Outlet Direction (Vertical Basis)=-, Pitch=3.81mm, Supplier=LCSC, Supplier Footprint=弯插,P=3.81mm, SupplierPart=C8387, Symbol=WJ15EDGRC-3.81-2P, Termination Style=无固定装置, Wire Gauge - AWG=-, Wire Gauge - mm2=-
R1: "电阻类型:薄膜电阻;阻值:26.1kΩ;精度:±0.1%;功率:62.5mW;工作电压:50V;温度系数:±25ppm/℃;", JLCPCB Part Class="Extended Part", LCSC Part Name="薄膜电阻 26.1kΩ ±0.1% 62.5mW", Manufacturer=YAGEO(国巨), ManufacturerPart=RT0402BRD0726K1L, Operating Temperature=-55℃~+155℃, Power(Watts)=62.5mW, Temperature Coefficient=±25ppm/℃, Tolerance=±0.1%, Voltage-Supply(Max)=50V, AddInBom=yes, ConvertToPcb=yes, Datasheet=https://item.szlcsc.com/datasheet/RT0402BRD0726K1L/775872.html, FootprintName=R0402, ModelId=98c88bc2b9094f218f3a3e30a7012738, ModelName=R0402_L1.0-W0.5-H0.4, ModelTransform=39.37,19.685,0,0,0,0,0,0,0, Supplier=LCSC, Supplier Footprint=0402, SupplierPart=C728557, Symbol=RT0402BRD0726K1L, Type=薄膜电阻
R2: "电阻类型:厚膜电阻;阻值:137kΩ;精度:±1%;功率:62.5mW;工作电压:50V;温度系数:±100ppm/℃;", JLCPCB Part Class="Extended Part", LCSC Part Name="137kΩ ±1% 62.5mW 厚膜电阻", Manufacturer=FOJAN(富捷), ManufacturerPart=FRC0402F1373TS, Operating Temperature=-55℃~+155℃, Power(Watts)=62.5mW, Temperature Coefficient=±100ppm/℃, Tolerance=±1%, Voltage-Supply(Max)=50V, AddInBom=yes, ConvertToPcb=yes, Datasheet=https://item.szlcsc.com/datasheet/FRC0402F1373TS/5781091.html, FootprintName=R0402, ModelId=98c88bc2b9094f218f3a3e30a7012738, ModelName=R0402_L1.0-W0.5-H0.4, ModelTransform=39.37,19.685,0,0,0,0,0,0,0, Supplier=LCSC, Supplier Footprint=0402, SupplierPart=C5153963, Symbol=FRC0402F1373TS, Type=厚膜电阻
R3: "电阻类型:厚膜电阻;阻值:0Ω;精度:±1%;功率:100mW;工作电压:75V;温度系数:-;", JLCPCB Part Class="Basic Part", LCSC Part Name="0Ω ±1% 100mW 厚膜电阻", Manufacturer=UNI-ROYAL(厚声), ManufacturerPart=0603WAF0000T5E, Operating Temperature=-55℃~+155℃, Power(Watts)=100mW, Temperature Coefficient=-, Tolerance=±1%, Voltage-Supply(Max)=75V, AddInBom=yes, ConvertToPcb=yes, Datasheet=https://item.szlcsc.com/datasheet/0603WAF0000T5E/21903.html, FootprintName=R0603, ModelId=fc143cca1e79419f9cd78b61e9279f08, ModelName=R0603, ModelTransform=31.8897,63.7794,0,90,0,0,0,0,0, Supplier=LCSC, Supplier Footprint=0603, SupplierPart=C21189, Symbol=0603WAF0000T5E, Type=厚膜电阻
R4: "电阻类型:厚膜电阻;阻值:10kΩ;精度:±1%;功率:100mW;工作电压:75V;温度系数:±100ppm/℃;", JLCPCB Part Class="Extended Part", LCSC Part Name="10kΩ ±1% 100mW 厚膜电阻", Manufacturer=FOJAN(富捷), ManufacturerPart=FRC0603F1002TS, Operating Temperature=-55℃~+155℃, Power(Watts)=100mW, Temperature Coefficient=±100ppm/℃, Tolerance=±1%, Voltage-Supply(Max)=75V, AddInBom=yes, ConvertToPcb=yes, Datasheet=https://item.szlcsc.com/datasheet/FRC0603F1002TS/3180495.html, FootprintName=R0603, ModelId=fc143cca1e79419f9cd78b61e9279f08, ModelName=R0603, ModelTransform=31.8897,63.7794,0,90,0,0,0,0,0, Supplier=LCSC, Supplier Footprint=0603, SupplierPart=C2906982, Symbol=FRC0603F1002TS, Type=厚膜电阻
R5 R7 R8 R9: "电阻类型:厚膜电阻;阻值:1kΩ;精度:±1%;功率:100mW;工作电压:75V;温度系数:±100ppm/℃;", JLCPCB Part Class="Basic Part", LCSC Part Name="1kΩ ±1% 100mW 厚膜电阻", Manufacturer=UNI-ROYAL(厚声), ManufacturerPart=0603WAF1001T5E, Operating Temperature=-55℃~+155℃, Power(Watts)=100mW, Temperature Coefficient=±100ppm/℃, Tolerance=±1%, Voltage-Supply(Max)=75V, AddInBom=yes, ConvertToPcb=yes, Datasheet=https://item.szlcsc.com/datasheet/0603WAF1001T5E/21904.html, FootprintName=R0603, ModelId=fc143cca1e79419f9cd78b61e9279f08, ModelName=R0603, ModelTransform=31.8897,63.7794,0,90,0,0,0,0,0, Supplier=LCSC, Supplier Footprint=0603, SupplierPart=C21190, Symbol=0603WAF1001T5E, Type=厚膜电阻
R6: "电阻类型:厚膜电阻;阻值:3.6kΩ;精度:±1%;功率:100mW;工作电压:75V;温度系数:±100ppm/℃;", JLCPCB Part Class="Extended Part", LCSC Part Name="3.6kΩ ±1% 100mW 厚膜电阻", Manufacturer=FOJAN(富捷), ManufacturerPart=FRC0603F3601TS, Operating Temperature=-55℃~+155℃, Power(Watts)=100mW, Temperature Coefficient=±100ppm/℃, Tolerance=±1%, Voltage-Supply(Max)=75V, AddInBom=yes, ConvertToPcb=yes, FootprintName=R0603, ModelId=fc143cca1e79419f9cd78b61e9279f08, ModelName=R0603, ModelTransform=31.8897,63.7794,0,90,0,0,0,0,0, Supplier=LCSC, Supplier Footprint=0603, SupplierPart=C2933208, Symbol=FRC0603F3601TS, Type=厚膜电阻
R10 R11 R12 R13 R14 R15 R16 R17: "电阻类型:厚膜电阻;阻值:100Ω;精度:±1%;功率:100mW;工作电压:75V;温度系数:±100ppm/℃;", JLCPCB Part Class="Extended Part", LCSC Part Name="100Ω ±1% 100mW 厚膜电阻", Manufacturer=FOJAN(富捷), ManufacturerPart=FRC0603F1000TS, Operating Temperature=-55℃~+155℃, Power(Watts)=100mW, Temperature Coefficient=±100ppm/℃, Tolerance=±1%, Voltage-Supply(Max)=75V, AddInBom=yes, ConvertToPcb=yes, Datasheet=https://item.szlcsc.com/datasheet/FRC0603F1000TS/3180494.html, FootprintName=R0603, ModelId=fc143cca1e79419f9cd78b61e9279f08, ModelName=R0603, ModelTransform=31.8897,63.7794,0,90,0,0,0,0,0, Supplier=LCSC, Supplier Footprint=0603, SupplierPart=C2906981, Symbol=FRC0603F1000TS, Type=厚膜电阻
R18 R19 R20 R21: "电阻类型:厚膜电阻;阻值:47Ω;精度:±1%;功率:62.5mW;工作电压:50V;温度系数:±100ppm/℃;", JLCPCB Part Class="Extended Part", LCSC Part Name="47Ω ±1% 62.5mW 厚膜电阻", Manufacturer=FOJAN(富捷), ManufacturerPart=FRC0402F47R0TS, Operating Temperature=-55℃~+155℃, Power(Watts)=62.5mW, Temperature Coefficient=±100ppm/℃, Tolerance=±1%, Voltage-Supply(Max)=50V, AddInBom=yes, ConvertToPcb=yes, Datasheet=https://item.szlcsc.com/datasheet/FRC0402F47R0TS/3186297.html, FootprintName=R0402, ModelId=98c88bc2b9094f218f3a3e30a7012738, ModelName=R0402_L1.0-W0.5-H0.4, ModelTransform=39.37,19.685,0,0,0,0,0,0,0, Supplier=LCSC, Supplier Footprint=0402, SupplierPart=C2909362, Symbol=FRC0402F47R0TS, Type=厚膜电阻
R22: "电阻类型:厚膜电阻;阻值:3kΩ;精度:±1%;功率:125mW;工作电压:150V;温度系数:±100ppm/℃;", JLCPCB Part Class="Extended Part", LCSC Part Name="3kΩ ±1% 125mW 厚膜电阻", Manufacturer=FOJAN(富捷), ManufacturerPart=FRC0805F3001TS, Operating Temperature=-55℃~+155℃, Power(Watts)=125mW, Temperature Coefficient=±100ppm/℃, Tolerance=±1%, Voltage-Supply(Max)=150V, AddInBom=yes, ConvertToPcb=yes, Datasheet=https://item.szlcsc.com/datasheet/FRC0805F3001TS/3180776.html, FootprintName=R0805, ModelId=37a81e68749a4138bd2dfa6897b24b85, ModelName=R0805_L2.0-W1.3-H0.6, ModelTransform=78.74,51.181,0,0,0,0,0,-0.0005,0, Supplier=LCSC, Supplier Footprint=0805, SupplierPart=C2907263, Symbol=FRC0805F3001TS, Type=厚膜电阻
SW1: "电路结构:单刀单掷;按钮形状:圆形按钮;作用力:1.6N;安装方式:立贴;开关长度:3.9mm;开关宽度:3mm;开关高度:2mm;带支架:不带支架;触点电流:50mA;额定电压:12V;带灯:-;工作寿命:10万次;", Actuator/Cap Color=黑色, Contact Current=50mA, IP Rating=-, JLCPCB Part Class="Basic Part", LCSC Part Name="3.9*3*2mm 立贴 轻触开关", Manufacturer=XUNPU(讯普), ManufacturerPart=TS-1088-AR02016, Operating Force=1.6N, Operating Temperature=-30℃~+80℃, Voltage Rating=12V, Actuator Style=圆形按钮, AddInBom=yes, Circuit=单刀单掷, ConvertToPcb=yes, Datasheet=https://item.szlcsc.com/datasheet/TS-1088-AR02016/763484.html, FootprintName=SW-SMD_L3.9-W3.0-P4.45, Length=3.9mm, Life=10万次, ModelId=b26698b69f274ffabef8a26c7d0e5dd1, ModelName=SW-SMD_L3.9-W2.9-H2.0-LS4.8, ModelTransform=188.976,114.174,0,0,0,0,0,0,0, Mounting Type=立贴, Supplier=LCSC, Supplier Footprint=SMD,4x3mm, SupplierPart=C720477, Switch Height=2mm, Symbol=TS-1088-AR02016, Termination Style=SMD接片, Width=3mm, with Bracket=不带支架, With Lamp=-
U1: "分辨率(位):24;采样率:4kHz;工作电压:2.7V~5.25V;接口类型:SPI;", Clock Frequency=4.096MHz, JLCPCB Part Class="Extended Part", LCSC Part Name="具有PGA和电压基准的低功耗、低噪声、高集成度6通道及12通道4kSPS、24位∑-Δ ADC", Manufacturer=TI(德州仪器), ManufacturerPart=ADS124S08IPBSR, Operating Temperature=-50℃~+125℃, Quiescent Current (Iq)=280uA, Voltage - Supply=2.7V~5.25V, Voltage Reference=内置, AddInBom=yes, Clock/Oscillator=内置, ConvertToPcb=yes, Datasheet=https://www.ti.com.cn/cn/lit/ds/symlink/ads124s08.pdf?ts=1739413233444&ref_url=https%253A%252F%252Fwww.ti.com.cn%252Fproduct%252Fcn%252FADS124S08, differential input=是, Features=多路复用器；双极性电源；自动校准；内置温度传感器, FootprintName=TQFP-32_L5.0-W5.0-P0.50-LS7.0-BL, Interface=SPI, ModelId=0723864a05e7424ab80b3c78d6a7d93a, ModelName=TQFP-32_L5.0-W5.0-H1.2-LS7.0-P0.50, ModelTransform=277.58783,277.58783,0,90,0,0,0.013,0,0, number of channels=12, Programmable Gain=支持, Resolution (Bits)=24, Sampling Rate=4kHz, Supplier=LCSC, Supplier Footprint=TQFP-32(5x5), SupplierPart=C39676001, Symbol=ADS124S08IPBSR_C39676001
U3: "CPU内核:ARM Cortex-M0+;CPU最大主频:64MHz;CPU位数:32 Bit;", JLCPCB Part Class="Extended Part", LCSC Part Name="主流Arm Cortex-M0+ MCU，具有64 KB Flash存储器、8 KB RAM、64 MHz CPU、2x USART、定时器、ADC和通信接口，1.7-3.6V", Manufacturer=ST(意法半导体), ManufacturerPart=STM32G031C8T6, Operating Temperature=-40℃~+85℃, Voltage - Supply=1.7V~3.6V, ADC (Bit)=12bit, AddInBom=yes, ConvertToPcb=yes, Core Size="32 Bit", CPU Core="ARM Cortex-M0+", CPU Maximum Speed=64MHz, Datasheet=https://item.szlcsc.com/datasheet/STM32G031C8T6/428993.html, EEPROM=-, FootprintName=LQFP-48_L7.0-W7.0-P0.50-LS9.0-BL, ModelId=093be70396ff421eb2cdb946d5311efc, ModelName=LQFP-48_L7.0-W7.0-H1.4-LS9.0-P0.50, ModelTransform=354.331,354.331,0,0,0,0,0,0,0, Number of I/O=44, Oscillator Type=内置+外置, Program Memory Type=FLASH, Program Storage Size=64KB, RAM Size=8KB, Supplier=LCSC, Supplier Footprint=LQFP-48(7x7), SupplierPart=C432205, Symbol=STM32G031C8T6
U7: "功能类型:降压型;工作电压:3.8V~32V;输出电压:-;输出电流:2A;输出类型:可调;", Frequency - Switching=500kHz, JLCPCB Part Class="Extended Part", LCSC Part Name="降压型 2A 3.8V~32V", Manufacturer=DIODES(美台), ManufacturerPart=AP63201WU-7, Operating Temperature=-40℃~+85℃, Output Current=2A, Output Voltage=-, Quiescent Current=22uA, Voltage - Supply=3.8V~32V, AddInBom=yes, ConvertToPcb=yes, Datasheet=https://item.szlcsc.com/datasheet/AP63201WU-7/2162627.html, Features=轻载高效模式；逐波限流；过流保护；EMI优化(抖频模式)；打嗝限流, FootprintName=TSOT-23-6_L2.9-W1.6-P0.95-LS2.8-BR, Function=降压型, ModelId=2c4039b5b88644c1bda4b4ba9e971667, ModelName=TSOT-23-6_L2.9-W1.6-H1.1-LS2.8-P0.95, ModelTransform=110.45568,114.173,0,180,0,0,-0.005,-0.0005,0, Number of Outputs=1, Output Type=可调, Supplier=LCSC, Supplier Footprint=TSOT-23-6, SupplierPart=C2071044, Switch tube (built-in/external)=内置, Symbol=AP63201WU-7, Synchronous Rectifier=是, Topology=降压式
U8 U9: "输出类型:固定;最大输入电压:6V;输出电压:3.3V;输出电流:300mA;输出极性:正极;", Dropout Voltage=140mV@(300mA), JLCPCB Part Class="Extended Part", LCSC Part Name="具有高 PSRR 的 300mA、超低噪声、低 IQ、低压降 (LDO) 线性稳压器", Manufacturer=TI(德州仪器), ManufacturerPart=TPS7A2033PDBVR, Maximum Input Voltage=6V, Operating Temperature=-40℃~+125℃@(Tj), Output Current=300mA, Output Voltage=3.3V, standby current=15uA, AddInBom=yes, ConvertToPcb=yes, Datasheet=https://www.ti.com/cn/lit/gpn/tps7a20, Feature=防静电保护；软启动；浪涌保护；低ESR；热保护(TSD)；欠压闭锁；过流保护(OCP)；带使能；防倒灌, FootprintName=SOT-23-5_L2.9-W1.6-P0.95-LS2.8-BR, ModelId=7ba65df16e7b4570af156e925f9c37fe, ModelName=SOT-23-5_L2.9-W1.6-P0.95-LS2.8-BR, ModelTransform=114.173,114.173,0,90,0,0,0,0,0, Number of Outputs=1, Output Polarity=正极, Output Type=固定, Supplier=LCSC, Supplier Footprint=SOT-23-5, SupplierPart=C2862740, Symbol=TPS7A2033PDBVR
U10: "类型:高侧开关;通道数:1;输入控制逻辑:高电平有效;工作电压:3.5V~40V;最大连续电流:4A;导通电阻:80mΩ;", JLCPCB Part Class="Extended Part", LCSC Part Name=单通道高侧开关，具备全面诊断功能、宽工作电压范围和可调节电流限制, Manufacturer=TI(德州仪器), ManufacturerPart=TPS27S100APWPR, Maximum Continuous Current=4A, Operating Temperature	-=-40℃~+125℃, Voltage - Supply=3.5V~40V, AddInBom=yes, Control Input Logic=高电平有效, ConvertToPcb=yes, Datasheet=https://www.ti.com/cn/lit/ds/symlink/tps27s100.pdf, Features=集成电荷泵；短路保护；反向电流阻断；过温保护；过流保护；欠压锁定, FootprintName=TSSOP-14_L5.0-W4.4-P0.65-LS6.4-BL-EP, ModelId=02f1f60386074b2ca8e111040ac061f2, ModelName=TSSOP-14_L5.0-W4.4-H1.0-LS6.4-P0.65, ModelTransform=236.714,196.85,0,90,0,0,0,0.0005,0, number of channels=1, RDS(on)=80mΩ, Supplier=LCSC, Supplier Footprint=HTSSOP-14-EP, SupplierPart=C2879389, Symbol=TPS27S100APWPR, Type=高侧开关
X1: "晶振类型:贴片晶振;频率:8MHz;常温频差:±10ppm;负载电容:12pF;频率稳定度:±20ppm;", Equivalent Series Resistance(ESR)=180Ω, Frequency Stability=±20ppm, JLCPCB Part Class="Extended Part", LCSC Part Name="YSX321SL 8MHZ 4P 3225 12PF ±10PPM -40~85℃ (±20PPM)", Load Capacitance=12pF, Manufacturer=YXC(扬兴晶振), ManufacturerPart=X32258MOB4SI, Normal temperature Frequency Tolerance=±10ppm, Operating Temperature=-40℃~+85℃, AddInBom=yes, ConvertToPcb=yes, Datasheet=https://item.szlcsc.com/datasheet/X32258MOB4SI/2777872.html, FootprintName=CRYSTAL-SMD_4P-L3.2-W2.5-BL, ModelId=ff2dfd5650294453a14147960efe1838, ModelName=CRYSTAL-SMD_4P-L3.2-W2.5-BL, ModelTransform=125.984,98.425,0,0,0,0,0,0,0, Supplier=LCSC, Supplier Footprint=SMD3225-4P, SupplierPart=C2682775, Symbol=X32258MOB4SI, Type=贴片晶振
U2: AddInBom=yes, ConvertToPcb=yes
U4 U5 U6: AddInBom=yes, ConvertToPcb=yes, SymbolName=PT1000焊盘

## Via types
v1: diameter 24, hole 12, Top Layer to Bottom Layer, tented both sides, 102 vias
v2: diameter 24, hole 12, Top Layer to Bottom Layer, 4 vias

## Nets (pads, with @x,y where several pads share a name; then routed paths per layer and width w, separated by ;. In a path a pad name is that pad's centre, name@x,y a point inside that pad or via, vN(x,y) a via of type N, cw(c..) or ccw(c..) an arc to the next point about the centre after c; other vN are vias at no path point)
3V3: C1.1 C3.1 C5.2 C6.1 C10.1 C21.1 C23.1 H1.1 R4.2 R9.2 U1.15 U1.16 U1.18 U3.4 U3.5 U3.6 U8.5 | length 1945.7
  Top Layer w10: R4.2@2491.13,1815.34 2650.66,1655.81 ; U1.15 U1.16 2844.68,2511.91 2845.69,2512.91 2911.41,2447.19 C5.2 2892.09,2501.96 2892.09,2529.66 2909.14,2546.7 2925.87,2546.7 2946.74,2525.83 U1.18
  Top Layer w15: R9.2 2637.2,1415 H1.1 2700,1472.11 2700,1630 ; R4.2 R4.2@2491.13,1815.34 ; 2650.66,1655.81 2650.66,1625.81 2658.91,1617.56 C23.1 ; C10.1 3017.79,2334.83 3017.79,2318.88 v1(3019.21,2317.46)
  Bottom Layer w15: v1(2690,1650) 2609.18,1730.82 2609.18,1907.21 v1@3019.61,2317.64
5V: C8.2 C14.1 C18.1 C25.2 C26.2 C29.1 C30.1 L1.2 LED2.2 R2.1 R8.2 U8.1 U8.3 U9.1 U9.3 | length 2054.4
  Top Layer w10: C8.2 1745.25,1848.21 1794.75,1848.21 v1(1795,1847.96) ; C26.2 v1@2205,1640 ; LED2.2 2207.99,2093.04 L1.2
  Top Layer w15: C29.1 3171.21,2403.67 3171.21,2349.33 v1(3171.42,2349.12)
  Bottom Layer w10: v1(1795,1847.96) 2002.04,1847.96 v1(2215,1635)
  Bottom Layer w15: v1@2284.6,1745.4 2284.6,1766.53 2867.8,2349.74 2974.05,2349.74 2975.6,2351.29 3026.48,2351.29 3028.03,2349.74 v1@3167.27,2349.74
  other v1: 2285,1745
A3V3: C4.1 C31.1 C32.1 U1.26 U9.5 | length 177.5
  Top Layer w10: U1.26 3052.78,2748.52 3076.14,2748.52 C4.1 3078.92,2751.3 3149.61,2751.3 C32.1@3169.66,2731.25
AIN0: C2.1 C11.2 R10.1 U1.7 | length 385.9
  Top Layer w10: C2.1 2541.54,2573.12 R10.1 2604.37,2575 C11.2 2610,2581.81 2631.57,2603.39 2710.28,2603.39 2781.37,2674.47 2781.37,2691.2 2760.5,2712.07 U1.7
AIN1: C11.1 C20.1 R11.1 U1.6 | length 348.3
  Top Layer w8: C20.1 2516.54,2719.21 2534.66,2701.09 R11.1 2604.37,2665 C11.1 ; C11.1@2610,2660.55 2632.57,2683.13 2632.8,2683.13 2695.83,2746.15 2753.71,2746.15 2773.59,2726.27 U1.6
AIN2: C12.1 C16.2 R12.1 U1.5 | length 280.3
  Top Layer w8: C12.1 2590.97,2792.58 R12.1@2590.97,2795.47 ; R12.1 2590.97,2798.35 2593.86,2795.47 2594.38,2795.99 2599.73,2795.99 2624.4,2771.33 2656.33,2771.33 2658,2773 2689.92,2773 2692.2,2770.72 2756.99,2770.72 2787.52,2740.19 U1.5
AIN3: C16.1 C33.1 R13.1 U1.4 | length 275.7
  Top Layer w8: R13.1 2678,2827 2712,2827 C16.1 2728.69,2827.84 U1.4@2802.25,2754.27 ; R13.1@2646.77,2859.83 2646.77,2895.21 2645.97,2896.01 2645.97,2912.58 C33.1
AIN4: C17.1 C19.2 R14.1 U1.3 | length 347.7
  Top Layer w10: C17.1 2666.22,3013.14 2728.96,3013.14 2734.18,3007.92 C19.2 ; C19.2@2734.93,2938.55 2735.36,2938.55 2756.94,2916.97 2756.94,2916.54 2790.48,2883 2790.48,2795.37 2799.69,2786.16 2799.69,2784.51 U1.3
AIN5: C19.1 C34.1 R15.1 U1.2 | length 311.9
  Top Layer w10: R15.1 2818.55,2939.63 2808.48,2929.56 2808.48,2803.83 2830.09,2782.22 U1.2 ; R15.1@2819.69,3008.89 2850.89,3040.09 C34.1
AIN6: C22.2 C35.1 R16.1 U1.32 | length 319.5
  Top Layer w10: C35.1 2981.5,2987.52 R16.1 2973.58,2979.6 2973.58,2932.95 2949.38,2908.75 U1.32@2949.38,2812.15 ; U1.32 U1.32@2949.38,2812.15 ; U1.32 U1.32@2949.38,2812.15 ; U1.32 U1.32@2949.38,2812.15
AIN7: C22.1 C36.1 R17.1 U1.31 | length 341
  Top Layer w10: U1.31@2947.08,2782.68 2947.47,2782.68 2963.5,2798.7 2963.5,2799.22 3057.22,2892.95 3057.22,2915 C22.1 3051.59,2932.22 3051.59,2983.75 R17.1 3049.54,2994.88 3093.83,2994.88 C36.1
AIN8: R16.2 U1.22 U6.1 | length 1107.6
  Top Layer w10: v1(2965.89,3276.86) 2963.4,3279.36 2963.4,3297.54 2986.49,3320.63 3020.63,3320.63 3025,3325 U6.1 3035,3275.63 3001.94,3242.57 3001.94,3067.28 2996.33,3061.67 2996.33,3060.54 2985.45,3049.66 R16.2 ; v1(2975,2615) 2975,2609.2 U1.22
  Bottom Layer w10: v1(2965.89,3276.86) 2964.44,3275.41 2964.44,2628.09 2975,2617.53 v1(2975,2615)
AIN9: R14.2 U1.21 U5.1 | length 1206.6
  Top Layer w10: v1@2635,3300 2645,3310 U5.1@2701.04,3310 ; U5.1 2728.65,3287.39 2728.65,3072.77 R14.2 ; v1@2927.86,2668.69 2926.49,2667.32 2926.49,2657.92 2927.86,2656.55 2927.86,2626.79 2964.64,2590 2966.08,2590 2988.49,2567.58 U1.21
  Bottom Layer w10: v1(2630,3295) 2630,3085.36 2880.74,2834.62 2880.74,2712.47 v1(2923.81,2669.41)
AIN10: R12.2 U1.20 U4.1 | length 1639
  Top Layer w10: v1@2340,3330 2350,3340 2370.44,3340 2400.44,3310 2400.44,3270.63 2549.03,3122.04 2549.03,2862.95 2549.83,2862.15 2549.83,2846.77 R12.2 ; v1@2900,2630 2904.58,2630 2905.01,2629.57 2905.01,2620.51 2935.2,2590.32 2936.54,2590.32 2956.71,2570.15 2958.37,2570.15 U1.20
  Bottom Layer w10: v1(2335,3325) 2335,3203.39 v1(2902.36,2636.04)
AIN11: R10.2 U1.19 U2.1 | length 2049.9
  Top Layer w10: v1@2170,3325 2136.89,3325 2121.89,3310 2121.89,2934.58 2480.34,2576.13 R10.2 ; 2920,2575 2922.68,2572.32 2928.36,2572.32 U1.19
  Bottom Layer w10: v1(2180,3325) 2182.68,3322.32 2182.68,3312.32 2920,2575
  other v1: 2905.93,2574.07
CS: R18.1 U3.16 | length 439.3
  Top Layer w10: R18.1 v1(2890,2135) ; v1(2944.07,1850.87) 2944.11,1850.83 U3.16 U3.16
  Bottom Layer w10: v1(2890,2135) 2890,1904.94 v1(2944.07,1850.87)
DIN: R20.1 U3.18 | length 101.6
  Top Layer w10: U3.18 3037.44,1890.28 3067.87,1890.28 3094.36,1916.76 3094.36,1916.82 3099.36,1921.83 3099.36,1947.32 R20.1
DOUT: R21.1 U3.17 | length 167.5
  Top Layer w10: U3.17 3037.44,1870.59 3104.36,1870.59 3158.68,1924.9 3158.68,1946.64 R21.1
EN: R7.1 U3.39 | length 110
  Top Layer w10: R7.1 2614.71,2017.77 2663.46,1969.02 2702.56,1969.02 U3.39
GND: C1.2 C2.2 C3.2 C4.2 C5.1 C6.2 C7.2 C9.1 C10.2 C12.2 C13.1 C14.2 C15.2 C17.2 C18.2 C20.2 C21.2 C23.2 C25.1 C26.1 C27.1 C28.1 C29.2 C30.2 C31.2 C32.2 C33.2 C34.2 C35.2 C36.2 H1.2 H4.3 LED1.1 LED3.1 P1.2 P2.2 R1.1 R3.1 R3.2 R6.2 R22.2 SW1.1 U1.1 U1.8 U1.14 U1.17 U1.24 U1.27 U1.28 U1.29 U7.4 U8.2 U9.2 U10.2 U10.15 X1.2 X1.4 | length 2291.9
  Top Layer w8: U7.4@1934.98,1819.07 1940.77,1819.07 U7.4
  Top Layer w10: R1.1 1872.04,1913.32 1896.49,1888.87 1896.49,1852.49 1930.9,1818.07 1941.77,1818.07 U7.4 ; 2104.99,2079.08 2108.78,2075.29 ; 2104.99,2199.99 v1(2130,2225) ; R6.2@2108.78,2040.88 R6.2 ; v1(2480,2745) 2481.73,2743.27 2481.73,2721.73 C20.2 ; v1(2508.46,2490.77) C2.2 ; v1(2630,2975) 2632.68,2972.32 2632.68,2965.28 2638.86,2959.1 2638.86,2952.25 C33.2@2638.45,2951.85 ; v1(2630,3050) 2630.56,3049.44 2663,3049.44 C17.2 ; U1.14 2816.17,2539.47 2795.3,2518.59 2795.3,2490.64 2892.97,2392.97 ; v1@2834.46,2828.75 2831.41,2825.7 2831.41,2816.11 2827.92,2812.63 2827.92,2811.96 U1.1 ; C34.2 2879.28,3006.28 2879.28,2975.72 v1(2880,2975) ; C7.2 2920,1535 2960.69,1494.31 v1@3039.93,1494.31 ; v1(2925.52,3059.59) 2926.64,3058.47 2926.64,3021.72 C35.2 ; U1.17 2933.09,2511.63 2970.25,2474.48 C5.1 2972.75,2470.58 2996.05,2493.89 v1(2998.55,2493.89) ; U1.27 3002.69,2725.99 2981.81,2705.11 2981.81,2658.07 U1.24 3076.51,2563.38 C15.2 3081.65,2564.77 3081.65,2603.35 v1(3075,2610) ; C9.1 3095.75,1668.39 v1(3130,1634.14) 3130,1500.16 3124.14,1494.31 v1@3039.93,1494.31 ; v1(3038.55,2453.89) 3009.43,2424.77 C10.2 3013.86,2421.14 v1(3045,2390) ; X1.4 3076.55,1530.93 v1@3039.93,1494.31 ; C36.2 3099.28,3033.41 3124.01,3033.41 v1(3126.57,3035.97) ; R3.1 3149.91,2802.91 3164.31,2817.32 3172.32,2817.32 v1(3175,2820) ; R3.1@3135.33,2803.72 3150.71,2803.72 3212.82,2741.6 3215.37,2741.6 3226.11,2730.86 C32.2 ; U9.2 3200.7,2537.73 3200.7,2579.29 v1(3202.84,2581.44) ; R22.2 3224.37,2967.68 3235,2978.3 v1(3235,2980)
  Top Layer w15: v1(2509.92,2806.38) 2509.92,2805.73 2533.3,2782.35 C12.2 ; 2980,2750 2988.77,2741.23 U1.28 2989.31,2740.19 3038.01,2788.89 C4.2 3038.55,2789.86 3092.58,2843.89 R3.2 3092.58,2856.47 3110.33,2874.22 v1(3110.33,2876.66)
  other v1: 2265,1415 2195,1470 1825,1485 1875,1485 2965,1485 3005,1485 3040,1485 3075,1485 3110,1485 3135,1505 2940.35,1514.65 1825,1530 1874.28,1529.74 2335,1530 2660,1535 3135,1535 2920,1550 2395,1565 2600,1565 3130,1567.15 2735,1570 1825,1575 1870,1575 2495,1585 2920,1585 2735,1600 3135,1600 2980,1625 2080,1640 3100,1660 1975,1670 3035,1670 3070,1670 2075,1715 3020,1715 1975,1745 3020,1755 1945,1785 1495,1875 1490,1945 1890,2000 1930,2000 2327.88,2087.21 2363.56,2133.49 3260,2145 3310,2215 2130,2295 2981.7,2321.3 3233.55,2358.89 2045,2390 3268.55,2398.89 1805,2430 1840,2430 3233.55,2463.89 1805,2470 1840,2470 2999.24,2660.65 3233.55,2668.89 2730,2695 3273.55,2728.89 2834.09,2828.75
  other v2: 2009.49,2200.5 1970.5,2200.51 2009.5,2239.49 1970.51,2239.5
NetC7_1: C7.1 U3.8 X1.3 | length 246.6
  Top Layer w10: U3.8 2899.53,1685.07 2920,1664.6 C7.1 2924.84,1631.7 2930.62,1631.7 2953.31,1609.01 2953.31,1567.55 2985.86,1535 2990,1535 2990,1534.79 X1.3
NetC8_1: C8.1 R1.2 R2.2 U7.1 | length 186.3
  Top Layer w8: C8.1 C8.1@1745.25,1881.79 ; R2.2@1794.75,1881.79 R2.2 R2.2@1797.68,1884.72 ; R1.2 R1.2@1842.18,1950.78 ; U7.1@1842.18,1893.87 1848.65,1887.4 U7.1 U7.1@1850.07,1884.72
  Top Layer w10: C8.1@1745.25,1881.79 R2.2@1794.75,1881.79 ; R2.2@1797.68,1884.72 U7.1@1850.07,1884.72 ; U7.1@1842.18,1893.87 R1.2@1842.18,1950.78
NetC9_2: C9.2 U3.9 X1.1 | length 238.3
  Top Layer w10: U3.9 2919.33,1732.56 2919.33,1702.14 2953.08,1668.39 C9.2 2979.92,1667.6 2990.16,1657.36 2990.16,1652.37 3008.06,1634.48 3039.93,1634.48 3076.55,1597.86 X1.1
NetC15_1: C15.1 U1.23 | length 82.4
  Top Layer w10: U1.23 3016.61,2595.15 3042.67,2569.08 3042.67,2525.79 C15.1
NetC24_1: C24.1 L1.1 U7.5
NetC24_2: C24.2 U7.6 | length 72.4
  Top Layer w15: U7.6 1952.52,1887.4 1955.49,1890.37 1955.49,1897.51 1970.54,1912.56 C24.2
NetLED1_2: LED1.2 R8.1 | length 80.1
  Top Layer w10: R8.1 2115.34,1470.17 LED1.2
NetLED2_1: LED2.1 R5.2 | length 65.1
  Top Layer w10: R5.2 2135.34,2160 LED2.1
NetLED3_2: LED3.2 R9.1 | length 80.9
  Top Layer w10: LED3.2 R9.1
NetR5_1: R5.1 U10.14 | length 79.4
  Top Layer w10: U10.14 2066.77,2107.09 2068.52,2105.34 2130,2105.34 R5.1
NetR6_1: R6.1 U10.13 | length 93.3
  Top Layer w10: U10.13@2041.24,2115.43 2041.24,2050.23 2060.34,2031.13 R6.1
NetR7_2: R7.2 U10.3 | length 809.6
  Top Layer w10: U10.3 2014.87,2325.23 2014.87,2356.63 2014.62,2356.87 2014.62,2406.23 2043.88,2435.49 2200.96,2435.49 2574.03,2062.42 R7.2
NetR18_2: R18.2 U1.9 | length 504.6
  Top Layer w10: U1.9 2730.09,2592.86 2730.09,2591.69 2692.87,2554.47 2692.87,2333.43 2837.95,2188.34 R18.2
NetR19_2: R19.2 U1.11 | length 424.1
  Top Layer w10: U1.11 2774.42,2581.22 2749.46,2556.26 2749.46,2459.32 2952.95,2255.83 R19.2
NetR20_2: R20.2 U1.10 | length 786.7
  Top Layer w10: U1.10 2721.07,2556 2721.07,2399.83 3100,2020.9 R20.2
NetR21_2: R21.2 U1.12 | length 756.8
  Top Layer w10: U1.12 2788.34,2567.31 2767.46,2546.43 2767.46,2493.03 3158.63,2101.86 3158.63,1983.41 R21.2
NRST: C13.2 H1.5 R4.1 SW1.2 U3.10 | length 1199.5
  Top Layer w10: SW1.2 2445.74,1983.5 2488.46,1940.79 C13.2 2488.46,1876.2 R4.1 2524.66,1874.66 2528.01,1871.31 v1(2642.78,1871.31) ; v1@2886.27,1815.57 2926.63,1775.21 2926.8,1775.21 2938.78,1763.22 2938.78,1732.8 U3.10
  Bottom Layer w10: v1(2642.78,1871.31) 2827.96,1871.31 v1(2877.47,1821.77) ; v1@2875,1819.98 2875,1530 2945,1460 2992.2,1460 H1.5
REFP0: R11.2 R13.2 R15.2 R17.2 R22.1 U1.30 U2.2 U4.2 U5.2 U6.2 | length 3908.7
  Top Layer w10: R11.2 2475.34,2666.13 2464.46,2677.01 2461.3,2677.01 2240,2898.31 2240,3349.37 2274.37,3383.74 2276.4,3383.74 2317.66,3425 2590,3425 ; R13.2 2604.83,2901.77 2604.83,2917.15 2604.03,2917.95 2604.03,3185.15 2518.55,3270.63 2518.55,3349.37 2590,3420.82 2590,3425 ; R15.2 2818.55,3314.41 U5.2 2819.15,3349.37 2894.78,3425 2895,3425 ; U1.30@2961.41,2768.03 2961.41,2768.23 2978.01,2784.83 2978.21,2784.83 3114.19,2920.81 3132.58,2920.81 R22.1@3145.63,2933.85 ; R17.2 3055.88,3060.54 3057.12,3060.54 3153.11,3156.53 U6.2 3183.37,3345.26 3219.41,3345.26 ; R22.1@3145.63,2934.81 3162.92,2952.11 3163.84,2952.11 3218.4,3006.67 3218.4,3345.26 ; 3218.91,3345.26 3218.91,3378.68 3172.59,3425 2895,3425 ; 2590,3425 2895,3425
SCLK: R19.1 U3.12 | length 493.7
  Top Layer w10: v1(2977.04,1786.96) 2978.15,1785.85 2978.15,1732.8 U3.12
  Bottom Layer w10: v1(2975,2225) 2976.02,2223.98 2976.02,1787.98 v1(2977.04,1786.96)
SWCLK: H1.3 U3.36 | length 688.8
  Top Layer w10: U3.36 2761.73,1825.76 v1(2763.73,1823.77)
  Bottom Layer w10: v1(2763.73,1823.77) 2762.29,1822.33 2762.29,1489.91 H1.3
SWDIO: H1.4 U3.35 | length 712.1
  Top Layer w10: U3.35 2781.42,2042.94 2782.78,2041.57 2782.78,2035.52 2811.2,2007.11 v1@2811.2,1823.93
  Bottom Layer w10: v1@2812.25,1815.64 2812.25,1539.95 H1.4
  other v1: 2812.25,1819.89
USART1_RX: U3.32
USART1_TX: U3.29
USART2_RX: H4.2 U3.14 | length 244.9
  Top Layer w10: U3.14 3206.42,1811.42 H4.2
USART2_TX: H4.1 U3.13 | length 233.8
  Top Layer w10: U3.13 3061.7,1791.73 3063.96,1789.47 3235.53,1789.47 H4.1
VIN: C27.2 C28.2 P2.1 U7.3 U10.8 U10.9 U10.10 U10.12
VOUT: P1.1 U10.5 U10.6 U10.7
pads on no net: *1.1 *2.1 *3.1 *4.1 U1.13 U1.25 U3.1 U3.2 U3.3 U3.7 U3.11 U3.15 U3.19 U3.20 U3.21 U3.22 U3.23 U3.24 U3.25 U3.26 U3.27 U3.28 U3.30 U3.31 U3.33 U3.34 U3.37 U3.38 U3.40 U3.41 U3.42 U3.43 U3.44 U3.45 U3.46 U3.47 U3.48 U7.2 U8.4 U9.4 U10.1 U10.4 U10.11
copper on no net:
  other v1: 2938.37,2715.36

## Polygon pours and split planes (outlines as drawn)
VOUT on Top Layer "NONET_L-01_P-001" (hatched Horizontal grid 4 track 5, remove dead copper, pour order 5): 1975,2415 1975,2290 1960,2275 1625,2275 1625,2415 1645,2425 1650,2430 1935,2430
NetC24_1 on Top Layer "NONET_L-01_P-001" (hatched Horizontal grid 4 track 5, remove dead copper, pour order 1): 1925,1875 1925,1830 1970,1830 2040,1760 2125,1760 2145,1780 2145,1935 2040,1935 2040,1890 1995,1890 1980,1875
VIN on Top Layer "NONET_L-01_P-001" (hatched Horizontal grid 4 track 5, remove dead copper, pour order 36): 1655,1645 1900,1645 1900,1780 1895,1785 1870,1785 1870,1835 1725,1835 1725,1940 1830,2045 1990,2045 2030,2085 2030,2160 1785,2160 1655,2030 1655,1985
5V on Top Layer "NONET_L-01_P-001" (hatched Horizontal grid 4 track 5, remove dead copper, pour order 18): 3138.55,2373.89 3143.55,2368.89 3203.55,2368.89 3203.55,2428.89 3178.55,2453.89 3178.55,2498.89 3268.55,2498.89 3268.55,2558.89 3228.55,2558.89 3218.55,2558.89 3218.55,2518.89 3183.55,2518.89 3178.55,2523.89 3178.55,2568.89 3138.55,2568.89 3133.55,2563.89 3133.55,2418.89
5V on Top Layer "NONET_L-01_P-001" (hatched Horizontal grid 4 track 5, remove dead copper, pour order 14): 2160,1940 2155,1935 2155,1745 2145,1735 2145,1510 2225,1510 2310,1595 2370,1595 2370,1600 2380,1610 2420,1610 2420,1520 2425,1515 2505,1515 2505,1560 2495,1570 2440,1570 2440,1595 2445,1600 2500,1600 2500,1655 2375,1780 2270,1780 2270,1940
A3V3 on Top Layer "NONET_L-01_P-001" (hatched Horizontal grid 4 track 5, remove dead copper, pour order 42): 3140,2595 3185,2595 3185,2695 3190,2700 3190,2770 3145,2770 3140,2765
5V on Top Layer "NONET_L-01_P-001" (hatched Horizontal grid 4 track 5, remove dead copper, pour order 41): 3200,2325 3195,2330 3195,2440 3180,2455 3180,2495 3260,2495 3275,2510 3270,2515 3270,2565 3215,2565 3215,2500 3190,2500 3180,2510 3185,2515 3185,2565 3140,2565 3135,2560 3140,2555 3140,2325
5V on Top Layer "NONET_L-01_P-001" (hatched Horizontal grid 4 track 5, remove dead copper, pour order 39): 2165,1935 2160,1930 2160,1755 2155,1755 2140,1740 2145,1735 2145,1510 2235,1510 2240,1505 2330,1595 2425,1595 2430,1590 2430,1525 2500,1525 2500,1565 2455,1565 2450,1570 2450,1605 2485,1605 2490,1610 2490,1690 2245,1935
GND on Top Layer "NONET_L-01_P-001" (hatched Horizontal grid 4 track 5, remove dead copper, pour order 45): 1390,3451.07 1390,1218.93 3471.43,1218.93 3471.43,3451.07
3V3 on Top Layer "NONET_L-01_P-001" (hatched Horizontal grid 4 track 5, remove dead copper, pour order 22): 2983.55,2348.89 3013.55,2378.89 3013.55,2388.89 3011.05,2388.89 2958.55,2441.39 2958.55,2458.89 2858.55,2553.89 2803.55,2513.89 2803.55,2503.89 2963.55,2343.89